# Altium PCB CanBUS_stepper_STM32.PcbDoc
Units mm, origin at the board's own origin, x right, y up, seen from the top; angles counter-clockwise.
Board outline 42.3 x 42.32 mm, 4 copper layers (Top Layer, Int1 (GND), Int2 (PWR), Bottom Layer), stack 1.334 mm thick; 83 components, 59 nets, 331 pads, 174 vias.
Unrouted connection lines stored in the file: 1.
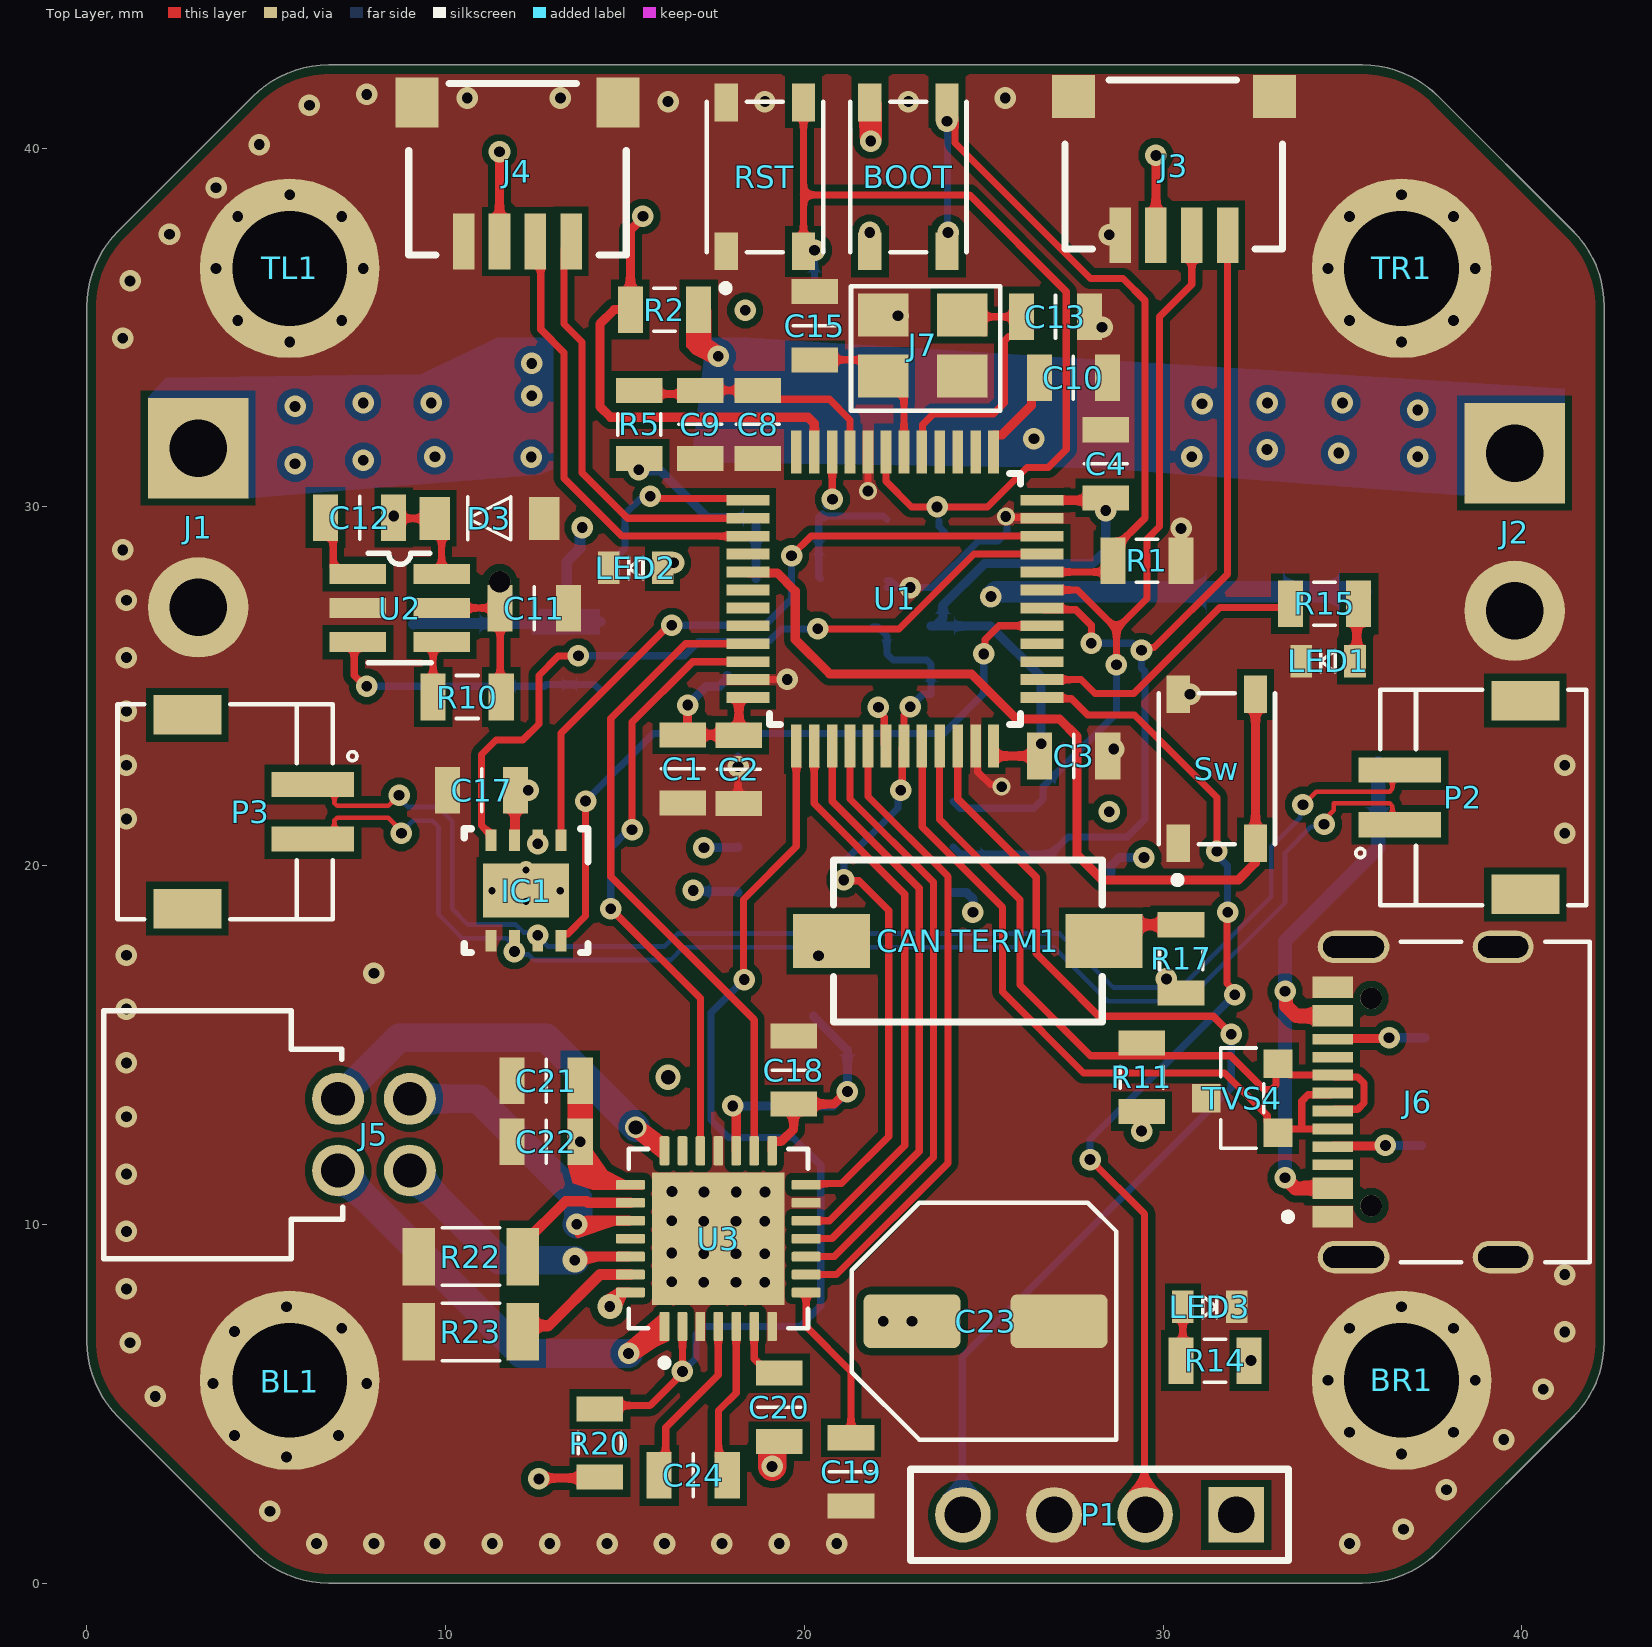
[diagram p0: Top Layer view]
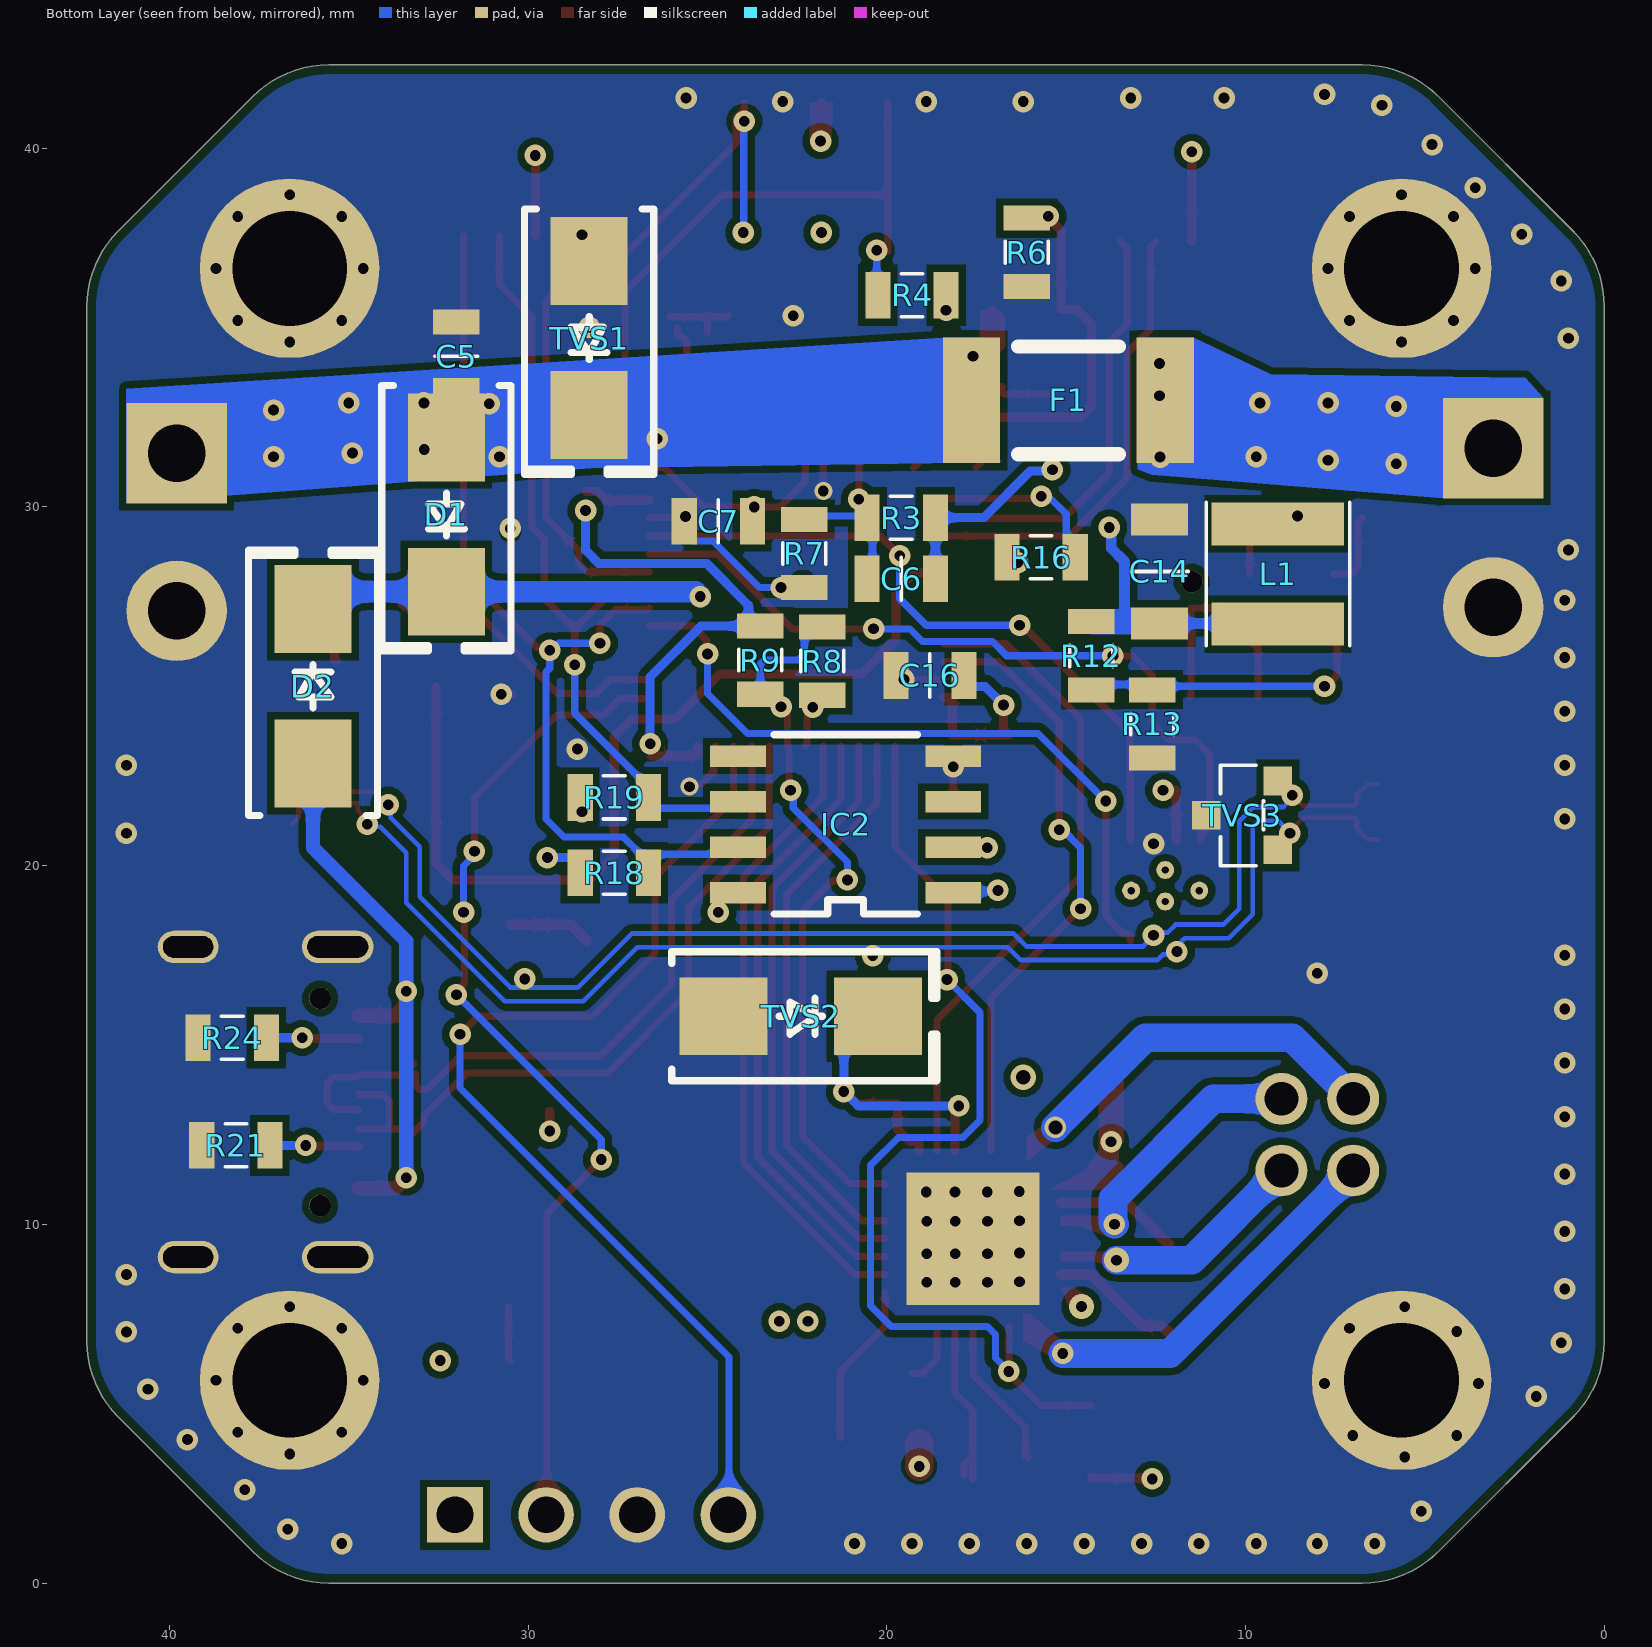
[diagram p1: Bottom Layer view, seen from below]
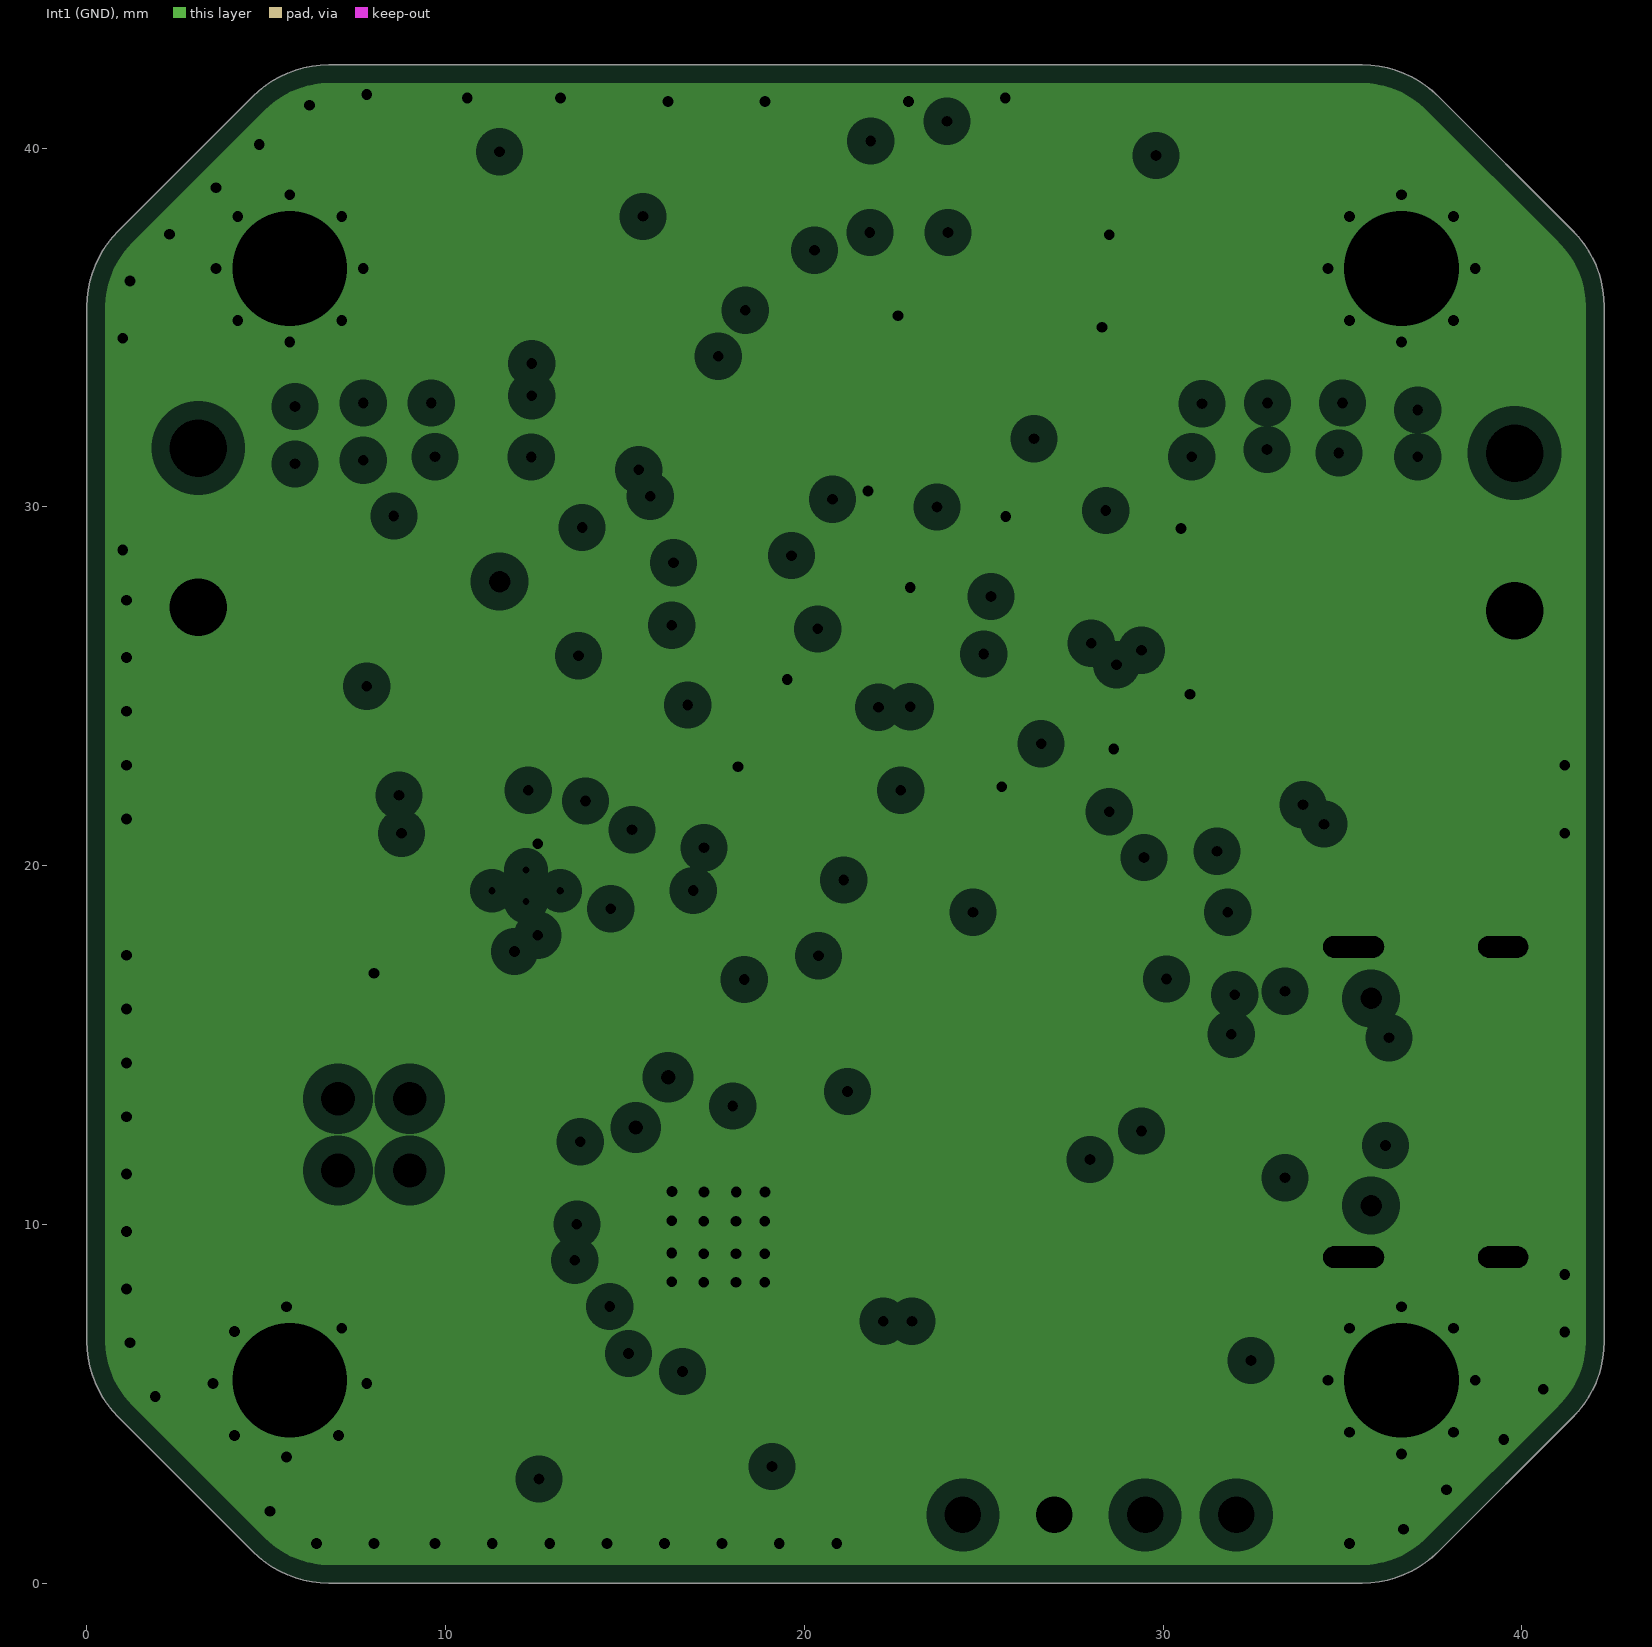
[diagram p2: Int1 (GND), clearances drawn from the general rule]
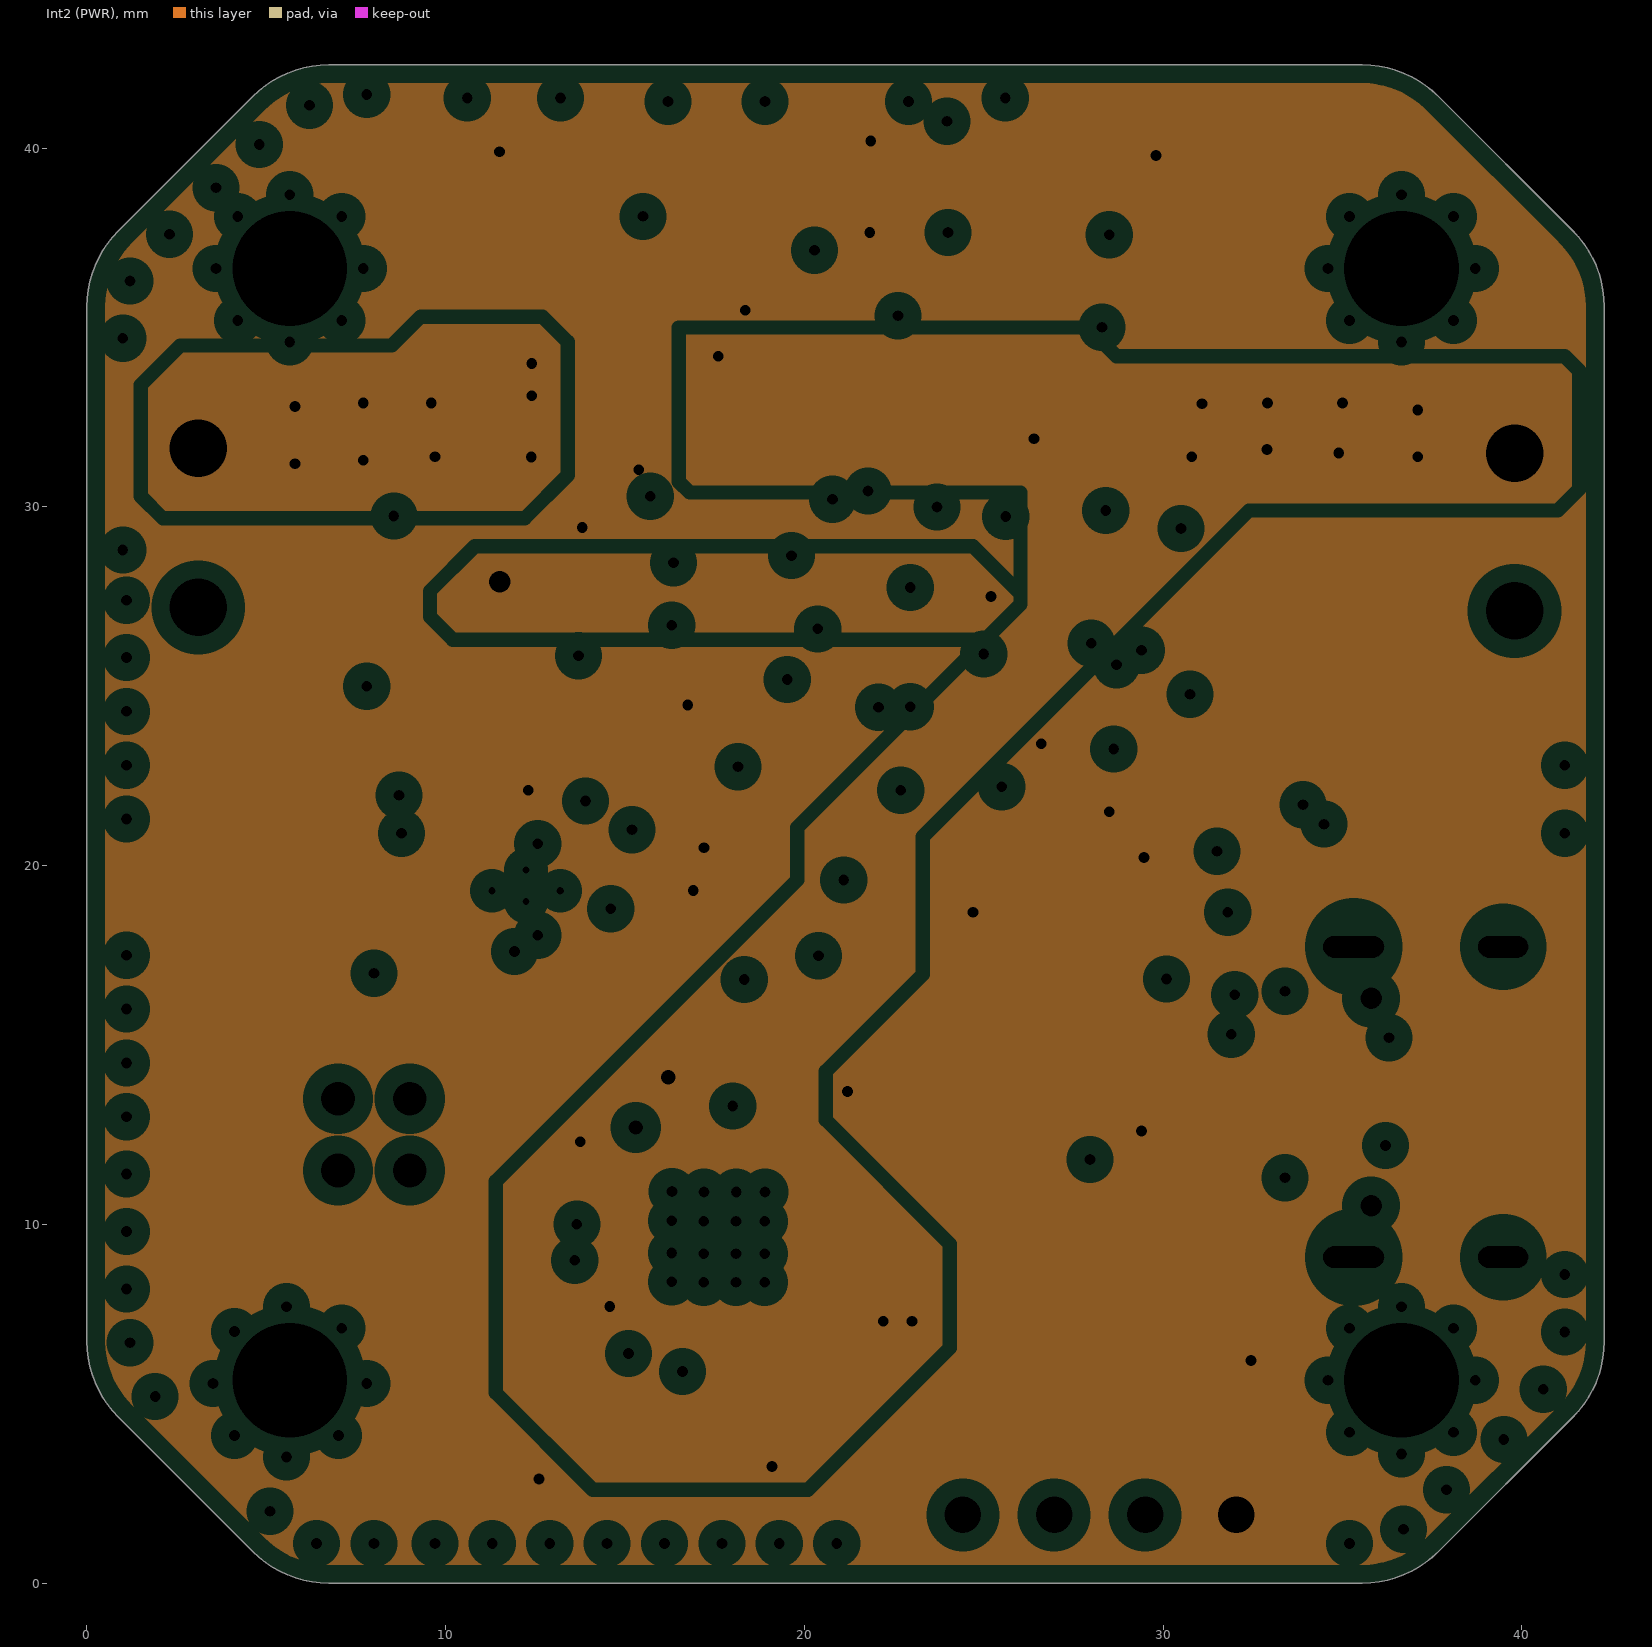
[diagram p3: Int2 (PWR), clearances drawn from the general rule]

## Layer stack, top to bottom
Top Solder: solder mask 0.0254, SM-001, Dk 4
Top Layer: signal copper 0.035
Dielectric 1: prepreg 0.1295, PP-017, Dk 4.3
Dielectric 2: prepreg 0.1295, PP-017, Dk 4.3
Int1 (GND): plane copper 0.0175, net GND
Dielectric 3: core 0.7112, Core-039, Dk 4.8
Int2 (PWR): plane copper 0.0175, net (Multiple Nets)
Dielectric 4: prepreg 0.1295, PP-017, Dk 4.3
Dielectric 5: prepreg 0.1295, PP-017, Dk 4.3
Bottom Layer: signal copper 0.035
Bottom Solder: solder mask 0.0254, SM-001, Dk 4

## Board outline
4.622,0.879 0.879,4.622 cw(c3,6.743) 0,6.743 0,35.577 cw(c3,35.577) 0.879,37.698 4.622,41.441 cw(c6.743,39.32) 6.743,42.32 35.557,42.32 cw(c35.557,39.32) 37.678,41.441 41.421,37.698 cw(c39.3,35.577) 42.3,35.577 42.3,6.743 cw(c39.3,6.743) 41.421,4.622 37.678,0.879 cw(c35.557,3) 35.557,0 6.743,0 cw(c6.743,3)

## Design rules (kind name [scope] priority, off if disabled: settings)
BoardOutlineClearance [All] p1: gap=0.254 ignorepadtopadclearanceinfootprint=FALSE except(0: Arc-SplitContinuation Track-SplitContinuation SMDPad-SplitContinuation THPad-SplitContinuation Via-SplitContinuation Fill-SplitContinuation Poly-SplitContinuation Region-SplitContinuation Text-SplitContinuation)
Clearance [All] p1: gap=0.195 ignorepadtopadclearanceinfootprint=FALSE
DiffPairsRouting [All] p1: maxlimit=1 minlimit=0.101 mostfreqgap=0.25 toplayer_minwidth=0.101 toplayer_maxwidth=0.381 toplayer_prefwidth=0.13 bottomlayer_minwidth=0.101 bottomlayer_maxwidth=0.381 bottomlayer_prefwidth=0.13 maxuncoupledlength=5
HoleSize [All] p1: absolutevalues=TRUE maxlimit=6 minlimit=0.2 maxpercent=80.000 minpercent=20.000
MinimumSolderMaskSliver [All] p1: minsoldermaskwidth=0.1
PlaneClearance [All] p1: clearance=0.508
PlaneConnect [All] p1: planeconnectstyle=Direct reliefexpansion=0.508 reliefentries=4 reliefconductorwidth=0.254 reliefairgap=0.254
PolygonConnect [All] p1: connectstyle=Direct reliefconductorwidth=0.254 reliefentries=4 polygonreliefangle="90 Angle" airgapwidth=0.254
RoutingCorners [All] p1: cornerstyle=45-Degree minsetback=2 maxsetback=2
RoutingVias [All] p1: holewidth=0.3 width=0.6 viastyle="Through Hole" minholewidth=0.2 minwidth=0.4 maxholewidth=6 maxwidth=6
SilkToSolderMaskClearance [IsPad] p1: minsilkscreentomaskgap=0.1 clearancetoexposedcopper=TRUE
SolderMaskExpansion [All] p1: expansion=0 istentingtop=FALSE
SupplyNets "Schematic Supply Nets_3" [InNet('3V3')] p1: voltage=0.000
SupplyNets "Schematic Supply Nets_2" [InNet('XT30_OUT')] p2: voltage=0.000
SupplyNets "Schematic Supply Nets_1" [InNet('5V')] p3: voltage=0.000
SupplyNets "Schematic Supply Nets" [InNet('GND')] p4: voltage=0.000
Width [All] p1: maxlimit=10 minlimit=0.127 preferedwidth=0.254 minimp=50.000000 maximp=50.000000 favimp=50.000000
23 further rules are at their usual default settings.

## Classes and differential pairs
differential pair USB_D: +USB_D_P -USB_D_N
differential pair CAN: +CAN_P -CAN_N

## Components (designator, comment, footprint, x,y, rotation, side; value= is the part's Value field where it differs from the comment)
BL1 "Mounting Hole" "Mounting Hole - Hole-3.2mm, Pad-5mm"#1 5.56,5.56 r0 top
BOOT "Tactile, SPST" SW_PTS810_SJM_250_SMTR_LFS 22.9,39.2 r270 top
BR1 "Mounting Hole" "Mounting Hole - Hole-3.2mm, Pad-5mm"#2 36.65,5.65 r0 top
C1 "Capacitor_Ceramic" Capacitor_Ceramic_M2012_I0805 16.604,22.696 r270 top value=4.7UFf
C2 "Capacitor_Ceramic" Capacitor_Ceramic_M2012_I0805 18.175,22.685 r90 top
C3 "Capacitor_Ceramic" Capacitor_Ceramic_M2012_I0805 27.506,23.056 r180 top
C4 "Capacitor_Ceramic" Capacitor_Ceramic_M2012_I0805 28.4,31.2 r270 top value=100nf
C5 "Capacitor_Ceramic" Capacitor_Ceramic_M2012_I0805 32.002,34.2 r90 bottom value=100nf
C6 "Capacitor_Ceramic" Capacitor_Ceramic_M2012_I0805 19.6,28 r0 bottom value=100nf
C7 "Capacitor_Ceramic" Capacitor_Ceramic_M2012_I0805 24.7,29.6 r180 bottom value=100nf
C8 "Capacitor_Ceramic" Capacitor_Ceramic_M2012_I0805 18.7,32.3 r270 top value=100nf
C9 "Capacitor_Ceramic" Capacitor_Ceramic_M2012_I0805 17.1,32.3 r270 top value=100nf
C10 "Capacitor_Ceramic" Capacitor_Ceramic_M2012_I0805 27.5,33.6 r0 top value=4.7uf
C11 "Capacitor_Ceramic" Capacitor_Ceramic_M2012_I0805 12.469,27.179 r0 top value=4.7uf
C12 "Capacitor_Ceramic" Capacitor_Ceramic_M2012_I0805 7.6,29.7 r0 top value=100nf
C13 "Capacitor_Ceramic" Capacitor_Ceramic_M2012_I0805 27,35.3 r0 top value=22pf
C14 "Capacitor_Ceramic" Capacitor_Ceramic_M3216_I1206 12.4,28.2 r90 bottom value=10uf
C15 "Capacitor_Ceramic" Capacitor_Ceramic_M2012_I0805 20.292,35.051 r90 top value=22pf
C16 "Capacitor_Ceramic" Capacitor_Ceramic_M2012_I0805 18.8,25.3 r0 bottom value=100nf
C17 "Capacitor_Ceramic" Capacitor_Ceramic_M2012_I0805 11,22.1 r180 top value=100nf
C18 "Capacitor_Ceramic" Capacitor_Ceramic_M2012_I0805 19.7,14.3 r270 top value=100nf
C19 "Capacitor_Ceramic" Capacitor_Ceramic_M2012_I0805 21.3,3.1 r90 top value=4.7uf
C20 "Capacitor_Ceramic" Capacitor_Ceramic_M2012_I0805 19.3,4.9 r90 top value=100nf
C21 "Capacitor_Ceramic" Capacitor_Ceramic_M2012_I0805 12.8,14 r180 top value=100nf
C22 "Capacitor_Ceramic" Capacitor_Ceramic_M2012_I0805 12.8,12.3 r180 top value=100nf
C23 "MAL214699103E3" CAPACİTOR_6.3_5.4 25,7.3 r0 top value=100uf
C24 "Capacitor_Ceramic" Capacitor_Ceramic_M2012_I0805 16.9,3 r180 top value=22nf
"CAN TERM1" "Slide, SPST" "Slide, SPST - C&K, SDA01HxS" 24.557,17.9 r270 top
D1 "Diode_Tvs" "DO214AA SMB" 32.281,29.785 r270 bottom
D2 "Diode_Tvs" "DO214AA SMB" 36,25 r90 bottom
D3 "Diode_Zener" Diode_SOD-123F 11.219,29.679 r180 top
F1 "Resistor" Resistor_Smd_M6332_I2512 14.94,32.973 r0 bottom value=12A
IC1 "TCAN3414DRBR" TCAN3414DRBR 12.241,19.302 r270 top
IC2 "MT6701" "SOIC-8, NB" 21.15,21.15 r0 bottom
J1 "2pin_header" 2pin_header#1 3.1,29.1 r270 top
J2 "2pin_header" 2pin_header#2 39.9,28.6 r270 top
J3 "SM04B-SRSS-TB" SM04B-SRSS-TB#1 30.3,39.6 r0 top
J4 "SM04B-SRSS-TB" SM04B-SRSS-TB#2 12,39.432 r0 top
J5 "878330420" 0878330420 9,11.5 r270 top
J6 "TYPE-C-31-M-12" HRO_TYPE-C-31-M-12 39.48,13.41 r90 top
J7 "SMD3225" SMD3225 23.3,34.5 r180 top
L1 "Inductor" "Taiyo Yuden - Power Inductor, 4040TK" 9.1,28.129 r270 bottom value=22uh
LED1 "Diode_Led" Diode_Smd_M1608_I0603_Blue 34.6,25.7 r180 top
LED2 "Diode_Led" Diode_Smd_M1608_I0603_Red 15.3,28.3 r180 top
LED3 "Diode_Led" Diode_Smd_M1608_I0603_Green 31.3,7.7 r0 top
P1 "TSW-104-08-G-S" SMTC-TSW-104-08-X-S 32.04,1.9 r180 top
P2 "S2B-ZR-SM4A-TF" JST_S2B-ZR-SM4A-TF 36.6,21.9 r270 top
P3 "S2B-ZR-SM4A-TF" JST_S2B-ZR-SM4A-TF 6.3,21.5 r90 top
R1 "Resistor" Resistor_Smd_M2012_I0805 29.55,28.5 r180 top value=10k
R2 "Resistor" Resistor_Smd_M2012_I0805 16.1,35.5 r0 top value=47k
R3 "Resistor" Resistor_Smd_M2012_I0805 19.6,29.7 r0 bottom value=10K
R4 "Resistor" Resistor_Smd_M2012_I0805 19.3,35.9 r0 bottom value=10k
R5 "Resistor" Resistor_Smd_M2012_I0805 15.4,32.3 r90 top value=ferrit
R6 "Resistor" Resistor_Smd_M2012_I0805 16.1,37.1 r90 bottom value=4.7k
R7 "Resistor" Resistor_Smd_M2012_I0805 22.3,28.7 r270 bottom value="10K NTC"
R8 "Resistor" Resistor_Smd_M2012_I0805 21.8,25.7 r270 bottom value=1k
R9 "Resistor" Resistor_Smd_M2012_I0805 23.528,25.728 r90 bottom value=4.7k
R10 "Resistor" Resistor_Smd_M2012_I0805 10.6,24.7 r0 top value=100k
R11 "Resistor" Resistor_Smd_M2012_I0805 29.4,14.1 r90 top value=1.5k
R12 "Resistor" Resistor_Smd_M2012_I0805 14.3,25.85 r90 bottom value=33k
R13 "Resistor" Resistor_Smd_M2012_I0805 12.6,23.95 r90 bottom value=10k
R14 "Resistor" Resistor_Smd_M2012_I0805 31.45,6.2 r0 top value=1k
R15 "Resistor" Resistor_Smd_M2012_I0805 34.5,27.3 r180 top value=1k
R16 "Resistor" Resistor_Smd_M2012_I0805 15.7,28.6 r180 bottom value=1k
R17 "Resistor" Resistor_Smd_M2012_I0805 30.5,17.4 r270 top value=120
R18 "Resistor" Resistor_Smd_M2012_I0805 27.6,19.8 r180 bottom value=4.7k
R19 "Resistor" Resistor_Smd_M2012_I0805 27.6,21.9 r180 bottom value=4.7k
R20 "Resistor" Resistor_Smd_M2012_I0805 14.3,3.9 r270 top value=10k
R21 "Resistor" Resistor_Smd_M2012_I0805 38.15,12.2 r180 bottom value=5.1K
R22 "Resistor" Resistor_Smd_M3216_I1206 10.7,9.1 r0 top value=100m
R23 "Resistor" Resistor_Smd_M3216_I1206 10.7,7 r0 top
R24 "Resistor" Resistor_Smd_M2012_I0805 38.25,15.2 r180 bottom value=5.1K
RST "Tactile, SPST" SW_PTS810_SJM_250_SMTR_LFS 18.9,39.2 r90 top
Sw "Tactile, SPST" SW_PTS810_SJM_250_SMTR_LFS 31.5,22.7 r90 top
TL1 "Mounting Hole" "Mounting Hole - Hole-3.2mm, Pad-5mm"#2 5.65,36.65 r0 top
TR1 "Mounting Hole" "Mounting Hole - Hole-3.2mm, Pad-5mm"#2 36.65,36.65 r0 top
TVS1 "Diode_Tvs" "DO214AA SMB" 28.3,34.708 r270 bottom
TVS2 "Diode_Tvs" "DO214AA SMB" 22.4,15.8 r180 bottom
TVS3 "Diode_Tvs_2P_Bidirectional" Diode_SOT-23-3_2P_Bidirectional_Type_1 10.1,21.4 r270 bottom
TVS4 "Diode_Tvs_2P_Bidirectional" Diode_SOT-23-3_2P_Bidirectional_Type_1 32.202,13.515 r270 top
U1 "STM32F303CCT6" "QFP-48, 7mm x 7mm, 0.5mm" 22.525,27.435 r270 top
U2 "LMR16006XDDCR" DDC0006A 8.719,27.179 r0 top
U3 "TMC2209-LA" QFN50P500X500X90-29N 17.6,9.6 r90 top

## Footprints (in the part's own frame and the unit in brackets; to place one, negate y for a bottom-side part, rotate by r counter-clockwise, add the part's x,y. Pads: shape width x height; smd on the part's side, far side on the other; paste and mask are expansions set on the pad)
2pin_header#1 [mm]
  rect 2.8x2.8 hole 1.6: 1(-2.54,0)
  round 2.8 hole 1.6: 2(1.9,0)
2pin_header#2 [mm]
  rect 2.8x2.8 hole 1.6: 1(-2.9,-0.1)
  round 2.8 hole 1.6: 2(1.5,-0.1)
0878330420 [mil]
  round 57 hole 37 paste-99999 mask+0: 1(0,0) 2(0,-78.74) 3(-78.74,0) 4(-78.74,-78.74)
  silkscreen extent -175,-336 97,-74, body extent -171,-331 91,10, height 242
Capacitor_Ceramic_M2012_I0805 [mm] "Capacitor_Ceramic_M2012_I0805"
  rect 0.7x1.3 smd mask+0.05: 1(-0.95,0) 2(0.95,0)
  silkscreen extent 0,-0.6 0,0.6, body extent -1.09,-0.64 1.09,0.64, height 1.26
Capacitor_Ceramic_M3216_I1206 [mm] "Capacitor_Ceramic_M3216_I1206"
  rect 0.9x1.6 smd mask+0.05: 1(-1.45,0) 2(1.45,0)
  silkscreen extent 0,-0.8 0,0.8, body extent -1.75,-0.81 1.75,0.81, height 1.61
CAPACİTOR_6.3_5.4 [mm]
  rrect25% 2.7x1.5 smd: 1(-2,0) 2(2.1,0)
  silkscreen extent -3.68,-3.3 3.7,3.3, body extent -3.5,-3.3 3.5,3.3, height 8.05
DDC0006A [mil]
  rect 62x22 smd paste-4 mask+2: 1(-46,37.4) 2(-46,0) 3(-46,-37.4) 4(46,-37.4) 5(46,0) 6(46,37.4)
  silkscreen extent -34,-60 34,60, body extent -56,-57 56,57, height 37
Diode_Smd_M1608_I0603_Blue [mm] "Diode_Smd_M1608_I0603_Blue"
  rect 0.6x0.9 smd mask+0.05: A(-0.75,0) C(0.75,0)
  silkscreen extent -0.2,-0.3 0.2,0.3, body extent -0.8,-0.4 0.8,0.4, height 0.7
Diode_Smd_M1608_I0603_Green [mm] "Diode_Smd_M1608_I0603_Green"
  rect 0.6x0.9 smd mask+0.05: A(-0.75,0) C(0.75,0)
  silkscreen extent -0.2,-0.3 0.2,0.3, body extent -0.8,-0.4 0.8,0.4, height 0.7
Diode_Smd_M1608_I0603_Red [mm] "Diode_Smd_M1608_I0603_Red"
  rect 0.6x0.9 smd mask+0.05: A(-0.75,0) C(0.75,0)
  silkscreen extent -0.2,-0.3 0.2,0.3, body extent -0.8,-0.4 0.8,0.4, height 0.7
Diode_SOD-123F [mm] "Diode_SOD-123F"
  rect 0.85x1.2 smd mask+0.05: A(-1.525,0) C(1.525,0)
  silkscreen extent -0.6,-0.6 0.6,0.6, body extent -1.85,-0.85 1.9,0.85, height 1.2
Diode_SOT-23-3_2P_Bidirectional_Type_1 [mm] "Diode_SOT-23-3_2P_Bidirectional_Type_1"
  rect 0.8x0.8 smd mask+0.05: Common(0,-1) D1(-0.96,1) D2(0.96,1)
  silkscreen extent -1.4,-0.6 1.4,0.6, body extent -1.46,-1.23 1.46,1.25, height 1.03
"DO214AA SMB" [mm] "Molded Diode, 2-Leads, Body 4.31x3.62mm, IPC Medium Density"
  rect 2.45x2.15 smd: A(-2.15,0) C(2.15,0)
  silkscreen extent -3.6,-1.8 3.8,1.8, body extent -2.6,-1.8 2.6,1.8, height 2.4
HRO_TYPE-C-31-M-12 [mm]
  rect 0.6x1.14 smd mask+0.05: A1_B12(-3.2,4.75) A4_B9(-2.4,4.75) B1_A12(3.2,4.75) B4_A9(2.4,4.75)
  rect 0.3x1.14 smd mask+0.05: A5(-1.25,4.75) A6(-0.25,4.75) A7(0.25,4.75) A8(1.25,4.75) B5(1.75,4.75) B6(0.75,4.75) B7(-0.75,4.75) B8(-1.75,4.75)
  oval 0.9x2 hole 0.6 slot 1.7 at 90 deg: S1(-4.325,4.17) S2(4.325,4.17)
  oval 0.9x1.7 hole 0.6 slot 1.4 at 90 deg: S3(-4.325,0) S4(4.325,0)
  round 0.6 hole 0.6 unplated: ""(-2.89,3.68) ""(2.89,3.68)
  silkscreen extent -4.47,-2.42 4.47,6.1, body extent -4.47,-2.6 4.47,5.31, height 3.31
JST_S2B-ZR-SM4A-TF [mm]
  rect 0.7x2.3 smd: 1(0.762,0) 2(-0.762,0)
  rect 1.1x1.9 smd: 3(-2.7,3.5) 4(2.7,3.5)
  silkscreen extent -3,-1.23 3,5.2, body extent -3.01,-0.84 2.99,5.66, height 3.7
"Mounting Hole - Hole-3.2mm, Pad-5mm"#1 [mm] "Mounting Hole - Hole-3.2mm, Pad-5mm"
  round 0.6 hole 0.3 mask+0.05: Hole(-2.05,0) Hole(-1.45,-1.45) Hole(-1.45,1.45) Hole(0,-2.05) Hole(0,2.14) Hole(1.45,-1.45) Hole(1.54,1.54) Hole(2.24,0)
  round 5 hole 3.2 mask+0.05: Hole(0.09,0.09)
"Mounting Hole - Hole-3.2mm, Pad-5mm"#2 [mm] "Mounting Hole - Hole-3.2mm, Pad-5mm"
  round 0.6 hole 0.3 mask+0.05: Hole(-2.05,0) Hole(-1.45,-1.45) Hole(-1.45,1.45) Hole(0,-2.05) Hole(0,2.05) Hole(1.45,-1.45) Hole(1.45,1.45) Hole(2.05,0)
  round 5 hole 3.2 mask+0.05: Hole(0,0)
QFN50P500X500X90-29N [mm]
  rrect25% 0.81x0.27 smd: 1(-2.45,1.5) 2(-2.45,1) 3(-2.45,0.5) 4(-2.45,0) 5(-2.45,-0.5) 6(-2.45,-1) 7(-2.45,-1.5) 15(2.45,-1.5) 16(2.45,-1) 17(2.45,-0.5) 18(2.45,0) 19(2.45,0.5) 20(2.45,1) 21(2.45,1.5)
  rrect25% 0.27x0.81 smd: 8(-1.5,-2.45) 9(-1,-2.45) 10(-0.5,-2.45) 11(0,-2.45) 12(0.5,-2.45) 13(1,-2.45) 14(1.5,-2.45) 22(1.5,2.45) 23(1,2.45) 24(0.5,2.45) 25(0,2.45) 26(-0.5,2.45) 27(-1,2.45) 28(-1.5,2.45)
  rect 3.7x3.7 smd paste-0.68: 29(0,0)
  silkscreen extent -3.56,-2.5 2.5,2.5, body extent -2.5,-2.5 2.5,2.5, height 0.9
"QFP-48, 7mm x 7mm, 0.5mm" [mm] "QFP-48, 7mm x 7mm, 0.5mm"
  rect 1.2x0.3 smd mask+0.05: 1(-4.1,2.75) 2(-4.1,2.25) 3(-4.1,1.75) 4(-4.1,1.25) 5(-4.1,0.75) 6(-4.1,0.25) 7(-4.1,-0.25) 8(-4.1,-0.75) 9(-4.1,-1.25) 10(-4.1,-1.75) 11(-4.1,-2.25) 12(-4.1,-2.75) 25(4.1,-2.75) 26(4.1,-2.25) 27(4.1,-1.75) 28(4.1,-1.25) 29(4.1,-0.75) 30(4.1,-0.25) 31(4.1,0.25) 32(4.1,0.75) 33(4.1,1.25) 34(4.1,1.75) 35(4.1,2.25) 36(4.1,2.75)
  rect 0.3x1.2 smd mask+0.05: 13(-2.75,-4.1) 14(-2.25,-4.1) 15(-1.75,-4.1) 16(-1.25,-4.1) 17(-0.75,-4.1) 18(-0.25,-4.1) 19(0.25,-4.1) 20(0.75,-4.1) 21(1.25,-4.1) 22(1.75,-4.1) 23(2.25,-4.1) 24(2.75,-4.1) 37(2.75,4.1) 38(2.25,4.1) 39(1.75,4.1) 40(1.25,4.1) 41(0.75,4.1) 42(0.25,4.1) 43(-0.25,4.1) 44(-0.75,4.1) 45(-1.25,4.1) 46(-1.75,4.1) 47(-2.25,4.1) 48(-2.75,4.1)
  silkscreen extent -3.5,-3.5 3.5,3.5, body extent -4.5,-4.5 4.5,4.5, height 1.52
Resistor_Smd_M2012_I0805 [mm] "Resistor_Smd_M2012_I0805"
  rect 0.7x1.3 smd mask+0.05: 1(-0.95,0) 2(0.95,0)
  silkscreen extent -0.3,-0.6 0.3,0.6, body extent -1,-0.61 1,0.61, height 0.6
Resistor_Smd_M3216_I1206 [mm] "Resistor_Smd_M3216_I1206"
  rect 0.9x1.6 smd mask+0.05: 1(-1.45,0) 2(1.45,0)
  silkscreen extent -0.8,-0.8 0.8,0.8, body extent -1.6,-0.81 1.6,0.81, height 0.65
Resistor_Smd_M6332_I2512 [mm] "Resistor_Smd_M6332_I2512"
  rect 1.6x3.5 smd mask+0.05: 1(-2.7,0) 2(2.7,0)
  silkscreen extent -1.4,-1.5 1.4,1.5, body extent -3.15,-1.61 3.15,1.61, height 0.7
"Slide, SPST - C&K, SDA01HxS" [mm] "Slide, SPST - C&K, SDA01HxS"
  rect 1.5x2.15 smd mask+0.05: A(0,3.8) B(0,-3.8)
  silkscreen extent -2.26,-3.74 2.26,3.74, body extent -1.74,-4.9 1.74,4.9, height 4.36
SM04B-SRSS-TB#1 [mm] "1.0mm pitch/Disconnectable Crimp style connector"
  rect 0.6x1.55 smd: 1(-1.5,-2.032) 2(-0.5,-2.032) 3(0.5,-2.032) 4(1.5,-2.032)
  rect 1.2x1.2 smd: SHIELD(-2.8,1.843) SHIELD(2.8,1.843)
  silkscreen extent -3.03,-2.41 3.03,2.3, body extent -3,-2.38 3,2.57, height 2.95
SM04B-SRSS-TB#2 [mm] "1.0mm pitch/Disconnectable Crimp style connector"
  rect 0.6x1.55 smd: 1(-1.5,-2.032) 2(-0.5,-2.032) 3(0.5,-2.032) 4(1.5,-2.032)
  rect 1.2x1.4 smd: SHIELD(-2.8,1.843) SHIELD(2.8,1.843)
  silkscreen extent -3.03,-2.41 3.03,2.37, body extent -3,-2.38 3,2.57, height 2.95
SMD3225 [mm]
  rect 1.4x1.2 smd: 1(-1.1,-0.85) 2(1.1,-0.85) 3(1.1,0.85) 4(-1.1,0.85)
  silkscreen extent -2.16,-1.65 2,1.82
SMTC-TSW-104-08-X-S [mm] ".025 SQ Post Terminal Strip Assembly, 1x4 Pins, Vertical, 2.54mm Pitch, Male"
  rect 1.55x1.55 hole 1.02: 1(0,0)
  round 1.55 hole 1.02: 2(2.54,0) 3(5.08,0) 4(7.62,0)
  silkscreen extent -1.46,-1.27 9.08,1.27, body extent -1.27,-1.27 8.89,1.27, height 8.38
"SOIC-8, NB" [mm] "SOIC-8, NB"
  rect 1.55x0.6 smd mask+0.05: 1(-3,1.905) 2(-3,0.635) 3(-3,-0.635) 4(-3,-1.905) 5(3,-1.905) 6(3,-0.635) 7(3,0.635) 8(3,1.905)
  silkscreen extent -2,-2.5 2,2.5, body extent -3.1,-2.5 3.1,2.5, height 1.75
SW_PTS810_SJM_250_SMTR_LFS [mm]
  rect 1.05x0.65 smd: A(-2.075,-1.075) A(2.075,-1.075) B(-2.075,1.075) B(2.075,1.075)
  silkscreen extent -2.1,-1.62 2.1,1.62, body extent -2.3,-1.6 2.3,1.6, height 2.7
"Taiyo Yuden - Power Inductor, 4040TK" [mm] "Taiyo Yuden - Power Inductor, 4040TK"
  rect 1.2x3.7 smd mask+0.05: 1(-1.4,0) 2(1.4,0)
  silkscreen extent -2,-2 2,2, body extent -2,-2 2,2, height 1.2
TCAN3414DRBR [mm]
  rect 0.6x0.3 smd paste+0 mask+0.051: 1(-1.4,0.975) 2(-1.4,0.325) 3(-1.4,-0.325) 4(-1.4,-0.975) 5(1.4,-0.975) 6(1.4,-0.325) 7(1.4,0.325) 8(1.4,0.975)
  rect 1.5x2.4 smd paste-1.187 mask+0.051: 9(0,0)
  round 0.5 hole 0.203 paste-2539.97 mask+0.051: V(-0.575,0) V(0,0.95) V(0,-0.95) V(0.302,0)
  silkscreen extent -1.73,-1.73 1.73,1.73, body extent -1.5,-1.51 1.5,1.49, height 0.77

## Part data
BL1 BR1 TL1 TR1: "Mechanical, Mounting Hole", Component Category=Mechanical, Component Type="Mounting Hole"
BOOT "CAN TERM1" RST Sw: "*", Operating Temperature, Max=+*℃, Operating Temperature, Min=-*℃, Component Category=Switch, ComponentLink1Description=Datasheet, ComponentLink2Description="Supplier Link"
  BOOT RST Sw: Component Type=Tactile
  "CAN TERM1": Component Type=Slide
C1 C4 C7 C8 C9 C10 C13 C15 R1 R4 R5 R8 R9 R11: Operating Temperature, Max=*℃, Package=0805, ComponentLink1Description=Datasheet, ComponentLink2Description="Supplier Link", Operating Temperature, Min=*℃
  C1 C4 C7 C8 C9 C10 C13 C15: Component Category=Capacitor, Component Type=Ceramic
  R1 R4 R5 R8 R9 R11: Component Category=Resistor, Component Type="Fixed Value"
C2 C3 D1 D2 D3 LED1 LED2 LED3 TVS4: Operating Temperature, Max=*℃, ComponentLink1Description=Datasheet, ComponentLink2Description="Supplier Link", Operating Temperature, Min=*℃
  C2 C3: Component Category=Capacitor, Component Type=Ceramic
  D1 D2: Component Category=Diode, Component Type=Zener, ComponentLink2URL=https://www.e-komponent.com/diode-30-v
  D3: Component Category=Diode, Component Type=Zener
  LED1 LED2 LED3: Component Category=Diode, Component Type=Led
  TVS4: Component Category=Diode, Component Type=TVS
C5 C12 C14 C16 C17 C18 C19 C20 C21 C22 C24: Operating Temperature, Max=*℃, Package=0.805, Voltage=35V, Component Category=Capacitor, Component Type=Ceramic, ComponentLink1Description=Datasheet, ComponentLink2Description="Supplier Link", Operating Temperature, Min=*℃
C6: Operating Temperature, Max=*℃, Package=0.805, Voltage=31V, Component Category=Capacitor, Component Type=Ceramic, ComponentLink1Description=Datasheet, ComponentLink2Description="Supplier Link", Operating Temperature, Min=*℃
C11: Operating Temperature, Max=*℃, Package=0.805, Voltage=50V, Component Category=Capacitor, Component Type=Ceramic, ComponentLink1Description=Datasheet, ComponentLink2Description="Supplier Link", Operating Temperature, Min=*℃
C23: "100 ÂµF 50 V Aluminum Electrolytic Capacitors Radial, Can - SMD - 1500 Hrs @ 125Â°C", Package="Radial Vishay BC", Availability="In Stock", Check_prices=https://www.snapeda.com/parts/MAL214699103E3/Vishay+BC+Components/view-part/?ref=eda, MF="Vishay BC", MP=MAL214699103E3, Price=None, Purchase-URL=https://pricing.snapeda.com/search?q=MAL214699103E3&ref=eda, SnapEDA_Link=https://www.snapeda.com/parts/MAL214699103E3/Vishay+BC+Components/view-part/?ref=snap
F1: Operating Temperature, Max=*℃, Package=6125, Component Category=fuse, Component Type="Fixed Value", ComponentLink1Description=Datasheet, ComponentLink2Description="Supplier Link", ComponentLink2URL=https://www.e-komponent.com/12-a-125-v-ac-125-v-dc-fuse-board-mount, Operating Temperature, Min=*℃, Supplier Link=https://www.e-komponent.com/12-a-125-v-ac-125-v-dc-fuse-board-mount
IC2: "Hall Effect Sensor Angle External Magnet, Not Included Gull Wing", Package="SOIC-8 ams", Check_prices=https://www.snapeda.com/parts/AS5600-ASOT/ams/view-part/?ref=eda, MF=ams, MP=AS5600-ASOT, SnapEDA_Link=https://www.snapeda.com/parts/AS5600-ASOT/ams/view-part/?ref=snap
J3 J4: "Connector Header Surface Mount 4 position 0.079 (2.00mm)", Package="NON STANDARD-4 JST", Check_prices=https://www.snapeda.com/parts/B4B-PH-SM4-TB%20(LF)(SN)/JST+Sales+America+Inc./view-part/?ref=eda, MF="JST Sales", MP="B4B-PH-SM4-TB (LF)(SN)", SnapEDA_Link=https://www.snapeda.com/parts/B4B-PH-SM4-TB%20(LF)(SN)/JST+Sales+America+Inc./view-part/?ref=snap
J5: "2.00mm Pitch, Milli-Grid PCB Header, Dual Row, Right-Angle, Through Hole, 4 Circuits, 0.38Âµm Gold (Au) Plating, without PCB Locator, without  Locking Window, without Center Polarization Slot, Tube", Manufacturer_Name="Molex Connector Corporation", Copyright="Copyright (C) 2026 Ultra Librarian. All rights reserved.", Manufacturer_Part_Number=878330420, RefDes=RefDes, Type=Type
J6: "USB Connectors 24 Receptacle 1 8.94*7.3mm RoHS", Package=Package, Check_prices=https://www.snapeda.com/parts/TYPE-C-31-M-12/HRO+Electronics+Co.%252C+Ltd./view-part/?ref=eda, MF="HRO Electronics Co., Ltd.", MP=TYPE-C-31-M-12, SnapEDA_Link=https://www.snapeda.com/parts/TYPE-C-31-M-12/HRO+Electronics+Co.%252C+Ltd./view-part/?ref=snap
J7: Package=None, Check_prices=https://www.snapeda.com/parts/SMD3225/Byte+Brothers/view-part/?ref=eda, MF=Others, MP=SMD3225, SnapEDA_Link=https://www.snapeda.com/parts/SMD3225/Byte+Brothers/view-part/?ref=snap
L1: "Inductor, Power, ???uH, ???A, ?x?x?mm", Operating Temperature, Max=*℃, Package=4040tk, Component Category=Inductor, Component Type="Power Inductor", ComponentLink1Description=Datasheet, ComponentLink2Description="Supplier Link", Operating Temperature, Min=*℃
P1: library part CMP-1024-00357-1, "0.025\" SQ Post Header, Through-hole, Vertical, -55 to 125 degC, 2.54 mm Pitch, 4-Pin, Male, RoHS", Manufacturer=Samtec, Temperature Range="-55 to 125 degC", ComponentLink1Description="Manufacturer URL", ComponentLink1URL=http://www.samtec.com, ComponentLink2Description=Datasheet, ComponentLink2URL=http://www.samtec.com/documents/webfiles/pdf/TSW_TH.PDF, ComponentLink3Description="Package Specification", ComponentLink3URL=http://www.samtec.com/documents/webfiles/cpdf/TSW-XXX-XX-XXX-X-XX-XXX-MKT.pdf, DatasheetVersion=F-214, Mounting Technology=Through-hole, Orientation=Vertical, PackageDescription=".025[0.64] SQ. Post Terminal Strip Assembly", PackageReference=TSW-104-08-X-S, PackageVersion="DM, 8/1988", PartNumber=TSW-104-08-G-S, Pitch="2.54 mm", RoHS=True
P2 P3: "Connector Header Surface Mount, Right Angle 2 position 0.059 (1.50mm)", Package=None, Check_prices=https://www.snapeda.com/parts/S2B-ZR-SM4A-TF/JST/view-part/?ref=eda, MF="JST Sales", MP=S2B-ZR-SM4A-TF, SnapEDA_Link=https://www.snapeda.com/parts/S2B-ZR-SM4A-TF/JST/view-part/?ref=snap
R2 R3 R6 R7 R10 R12 R13 R14 R15 R16 R17 R18 R19 R20 R21 R22 R23 R24: Operating Temperature, Max=*℃, Package=0.805, Component Category=Resistor, Component Type="Fixed Value", ComponentLink1Description=Datasheet, ComponentLink2Description="Supplier Link", Operating Temperature, Min=*℃
TVS1: Operating Temperature, Max=*℃, Voltage, Break Down=31.1V, Voltage, Stand Off=28V, Component Category=Diode, Component Type=Zener, ComponentLink1Description=Datasheet, ComponentLink2Description="Supplier Link", ComponentLink2URL=https://www.ozdisan.com/p/tvs-diyotlar-386/hottech-smbj28a-ht-503588, Operating Temperature, Min=*℃
TVS2: Operating Temperature, Max=*℃, Voltage, Stand Off=6V, Component Category=Diode, Component Type=Zener, ComponentLink1Description=Datasheet, ComponentLink2Description="Supplier Link", Operating Temperature, Min=*℃
TVS3: Operating Temperature, Max=*℃, Package=SOT23, Voltage, Break Down="26.2 V", Voltage, Stand Off="24 V", Component Category=Diode, Component Type=TVS, ComponentLink1Description=Datasheet, ComponentLink2Description="Supplier Link", Operating Temperature, Min=*℃
U1: "ARMÂ® CortexÂ®-M4 STM32F3 Microcontroller IC 32-Bit 72MHz 256KB (256K x 8) FLASH 48-LQFP (7x7)", Package="LQFP-48 STMicroelectronics", Availability="In Stock", Check_prices=https://www.snapeda.com/parts/STM32F303CCT6/STMicroelectronics/view-part/?ref=eda, MF=STMicroelectronics, MP=STM32F303CCT6, Price=None, Purchase-URL=https://pricing.snapeda.com/search/part/STM32F303CCT6/?ref=eda, SnapEDA_Link=https://www.snapeda.com/parts/STM32F303CCT6/STMicroelectronics/view-part/?ref=snap
U2: "SIMPLE SWITCHER&reg; 4V to 60V, 600mA Step-Down Regulator with Low Iq 6-SOT-23-THIN -40 to 125", Manufacturer="Texas Instruments", PartNumber=LMR16006XDDC, CompType=IC, Copyright="Copyright (C) 2026 Ultra Librarian. All rights reserved.", Manufacturer_Name="Texas Instruments", Manufacturer_Part_Number=LMR16006XDDCR, MountType=SMT, PackageReference=DDC0006A, RefDes=RefDes, RoHS=Y, Type=TYPE
U3: "Bipolar Motor Driver Power MOSFET Step/Direction, UART 28-QFN (5x5)", Package=None, Check_prices=https://www.snapeda.com/parts/TMC2209-LA/Maxim+Integrated/view-part/?ref=eda, MF="Maxim Integrated Products", MP=TMC2209-LA, SnapEDA_Link=https://www.snapeda.com/parts/TMC2209-LA/Maxim+Integrated/view-part/?ref=snap

## Free pads (board coordinates)
  rect 3.7x3.7 smd far side: 2(17.6,9.6)

## Via types
v1: diameter 0.6, hole 0.3, Top Layer to Bottom Layer, 166 vias
v2: diameter 0.5, hole 0.3, Top Layer to Bottom Layer, 3 vias
v3: diameter 0.7, hole 0.3, Top Layer to Bottom Layer, 2 vias
v4: diameter 0.6, hole 0.6, Top Layer to Bottom Layer, 1 vias
v5: diameter 0.6, hole 0.4, Top Layer to Bottom Layer, 1 vias
v6: diameter 0.7, hole 0.4, Top Layer to Bottom Layer, 1 vias

## Nets (pads, with @x,y where several pads share a name; then routed paths per layer and width w, separated by ;. In a path a pad name is that pad's centre, name@x,y a point inside that pad or via, vN(x,y) a via of type N, cw(c..) or ccw(c..) an arc to the next point about the centre after c; other vN are vias at no path point)
3V3: BOOT.A C1.1 C2.2 C3.2 C4.2 C6.1 C14.1 C16.1 C17.1 C18.2 IC1.3 IC2.1 IC2.2 IC2.8 J3.2 J4.2 L1.2 P1.1 R3.1 R4.1 R5.1 R9.2 R11.1 R12.2 R14.2 R18.1 R19.1 R20.2 TVS2.C U1.24 U1.36 U1.48 U3.15 U3.17 | length 58.5
  Top Layer w0.254: J4.2 v1(11.5,39.9) ; IC1.3 11.933,20.719 11.933,22.085 11.948,22.1 v1(12.3,22.1) ; v1(12.6,2.9) 12.625,2.925 14.275,2.925 R20.2 ; C1.1@16.6,23.65 16.608,23.643 18.167,23.643 C2.2 18.175,24.662 18.198,24.685 U1.24 ; C1.1 16.746,23.788 v1(16.746,24.477) ; v1(18,13.3) 18,13.206 18.1,13.106 U3.17 ; U3.15 19.1,12.287 19.135,12.322 19.372,12.322 19.7,12.65 C18.2 19.702,13.352 20.813,13.352 21.16,13.7 v1(21.2,13.7) ; U1.36 25.275,23.079 25.298,23.056 C3.2 ; U1.48 27.825,30.185 28.075,30.435 C4.2@28.375,30.435 ; v1(29.4,12.6) R11.1 ; J3.2 v1(29.8,39.8) ; R14.2 v1(32.45,6.2)
  Bottom Layer w0.254: v1(15.385,31.035) 15.42,31 16.001,31 17.301,29.7 R3.1 C6.1 ; v1(16.746,24.477) 17.268,24.998 17.627,24.998 17.85,25.222 C16.1 ; v1(16.903,19.309) 16.931,19.281 18.114,19.281 IC2.1 ; v1(17.2,20.5) 17.208,20.508 18.143,20.508 IC2.2 ; v1(18,13.3) 20.8,13.3 v1(21.2,13.7) 21.2,14.852 TVS2.C TVS2.C ; IC2.8 24.527,19.245 24.7,19.072 v1(24.7,18.7) ; v1(26.6,23.4) 26.6,25.26 25.182,26.678 R9.2 23.637,26.678 23.86,26.901 23.86,27.26 25.023,28.423 28.036,28.423 28.4,28.787 v1(28.4,29.9) ; R18.1 28.55,20 28.773,20.223 v1(29.465,20.223)
  Bottom Layer w0.3: L1.2 9.121,26.75 C14.1 12.45,26.8 13.375,26.8 ; v1(13.804,29.426) 13.746,29.368 13.746,28.846 13.375,28.475 13.375,26.8 ; R12.2 13.375,26.8
  other v1: 28.5,21.5 18.349,35.481 21.825,37.65 21.85,40.2
5V: C19.2 U3.8 | length 4.6
  Top Layer w0.2: U3.8 20.05,7.15 21.3,5.9 C19.2
A1: J5.3 U3.24 | length 6.6
  Bottom Layer w0.8: J5.3 10.9,13.5 13.697,10.703 13.697,10.041 v1(13.657,10.001)
A2: J5.4 U3.21 | length 10
  Bottom Layer w0.8: J5.4 8.7,15.2 12.8,15.2 v5(15.3,12.7)
AUX1: J4.3 U1.15 | length 12.7
  Top Layer w0.2: J4.3 12.65,37.25 12.65,34.95 13.3,34.3 13.3,30.8 14.915,29.185 U1.15
AUX2: J4.4 U1.14 | length 11.9
  Top Layer w0.2: J4.4 13.3,37.2 13.3,36.608 13.3,35.1 13.8,34.6 13.8,30.951 15.066,29.685 U1.14
B1: J5.1 U3.26 | length 5.6
  Bottom Layer w0.8: J5.1 11.5,9 v3(13.6,9)
B2: J5.2 U3.1 | length 10.2
  Bottom Layer w0.8: J5.2 12.1,6.4 v1(15.1,6.4)
CAN_N: "CAN TERM1.B" IC1.6 P2.1 P3.2 TVS3.D2 | length 38.7
  Top Layer w0.127: P3.2 6.612,20.738 6.899,21.025 6.899,21.262 6.973,21.337 8.4,21.337 8.765,20.972 v1(8.765,20.902) ; v1(34.489,21.156) 34.489,21.282 34.755,21.548 34.755,21.736 36.32,21.736 36.394,21.662 36.394,21.344 P2.1
  Bottom Layer w0.13: v1(8.765,20.902) 8.765,20.934 9.085,21.254 9.629,21.254 9.8,21.083 9.8,18.643 10.465,17.977 11.699,17.977 11.775,17.901 11.775,17.87 11.838,17.807 11.838,17.68 11.997,17.52 12.313,17.52 12.466,17.367 16.267,17.367 16.626,17.726 20.392,17.726 26.955,17.726 28.461,16.22 30.649,16.22 33.4,18.971 33.4,20.363 34.121,21.084 34.418,21.084 v1(34.489,21.156)
  other v1: 20.392,17.489 11.916,17.602
CAN_P: IC1.7 P2.2 P3.1 R17.2 TVS3.D1 | length 38.5
  Top Layer w0.127: P3.1 6.612,22.262 6.899,21.975 6.899,21.738 6.973,21.663 8.4,21.663 8.697,21.96 v1(8.7,21.96) ; v1(33.9,21.697) 34.267,22.063 36.32,22.063 36.394,22.138 36.394,22.456 P2.2
  Bottom Layer w0.13: v1(8.7,21.96) 8.7,21.877 8.943,21.634 9.787,21.634 10.18,21.241 10.18,18.8 10.623,18.357 11.952,18.357 12.174,18.135 12.489,18.135 v1(12.567,18.057) 12.567,18.029 12.849,17.747 16.11,17.747 16.469,18.106 27.112,18.106 28.618,16.6 30.093,16.6 30.492,16.6 33.02,19.128 33.02,20.52 33.828,21.329 33.828,21.625 v1(33.9,21.697)
  other v1: 30.093,16.841
CAN_RX: IC1.4 U1.45 | length 21.2
  Top Layer w0.2: IC1.4 11.266,20.852 11,21.119 11,23.1 11.4,23.5 12.15,23.5 12.6,23.95 12.6,25.3 13.14,25.84 13.69,25.84 v1(13.7,25.85) ; v1(20.373,26.6) 22.641,26.6 24.726,28.685 U1.45
  Bottom Layer w0.2: v1(13.7,25.85) 16.662,25.85 17.057,26.245 19.004,26.245 19.359,26.6 v1(20.373,26.6)
CAN_STB: IC1.8 U1.41 | length 19.9
  Top Layer w0.2: IC1.8@13.216,17.91 13.216,18.052 13.266,18.102 13.408,18.102 13.9,18.594 v1(13.9,21.8) ; v1(25,25.9) 25.038,25.938 25.038,26.299 25.425,26.685 U1.41
  Bottom Layer w0.2: v1(13.9,21.8) 15.785,23.685 23.885,23.685 25,24.8 v1(25,25.9)
CAN_TX: IC1.1 U1.46 | length 19.4
  Top Layer w0.2: IC1.1 13.216,23.689 15.545,26.018 16.227,26.7 v1(16.3,26.7) ; v1(19.642,28.642) 20.185,29.185 U1.46
  Bottom Layer w0.2: v1(16.3,26.7) 18.9,26.7 19.642,27.442 v1(19.642,28.642)
DIAG: U1.27 U3.11 | length 16.5
  Top Layer w0.2: U3.11 20.766,9.6 23.2,12.034 23.2,19.37 20.775,21.795 U1.27
DIR: U1.22 U3.19 | length 17.2
  Top Layer w0.2: v1(14.6,18.8) 17.1,16.3 U3.19 ; v1(15.195,21) 15.195,23.995 16.885,25.685 U1.22
  Bottom Layer w0.2: v1(14.6,18.8) 14.6,20.5 15.1,21 v1(15.195,21)
GND: BL1.Hole BR1.Hole C1.2 C2.1 C3.1 C4.1 C5.2 C7.1 C8.2 C9.2 C10.2 C11.2 C13.2 C14.2 C15.2 C16.2 C17.2 C18.1 C19.1 C21.2 C22.2 C23.2 D3.A IC1.2 IC1.5 IC2.4 J1.2 J2.2 J3.1 J3.SHIELD J4.1 J4.SHIELD J6.A1_B12 J6.B1_A12 J6.S1 J6.S2 J6.S3 J6.S4 J7.2 J7.4 LED1.C LED2.C LED3.C P1.3 pad.2 R1.1 R6.1 R7.2 R13.1 R21.1 R22.1 R23.1 R24.1 RST.B Sw.B TL1.Hole TR1.Hole TVS1.A TVS2.A TVS3.Common TVS4.Common U1.8 U1.23 U1.35 U1.47 U2.2 U3.3 U3.7 U3.13 U3.18 U3.29 | length 13.2
  Top Layer w0.2: C9.2 17.268,31.35 C9.2@17.518,31.1 ; v1(18.15,22.755) 18.15,21.76 C2.1 ; U1.23 18.427,25.187 19.521,25.187 v1(19.524,25.19) ; C8.2 19,31.35 C8.2@19.25,31.1 ; v2@21.773,30.365 v2(21.773,30.445) 21.774,30.446 U1.8 U1.8 ; U1.35 24.825,23.285 24.825,22.618 25.185,22.257 25.443,22.257 v2(25.5,22.2) ; v2(25.615,29.731) 25.639,29.708 26.602,29.708 U1.47 ; Sw.B@30.425,24.775 Sw.B@30.446,24.796 ; R1.1 v1(30.5,29.4)
  Bottom Layer w0.2: v1(18.15,22.755) IC2.4 ; R7.2 R7.2@22.6,27.75 ; R7.2@22.3,27.95 22.4,27.95 R7.2@22.6,27.75 ; v2(25.615,29.731) 25.615,29.635 C7.1 25.65,29.3 25.4,29.05 24.85,29.05 23.55,27.75 v1(22.95,27.75) R7.2@22.6,27.75 ; v1@30.5,29.3 v1(30.5,29.4)
  other v1: 6.4,1.1 8,1.1 9.7,1.1 11.3,1.1 12.9,1.1 14.5,1.1 16.1,1.1 17.7,1.1 19.3,1.1 20.9,1.1 35.2,1.1 36.7,1.5 5.1,2 37.9,2.6 39.5,4 1.9,5.2 40.6,5.4 1.2,6.7 41.2,7 1.1,8.2 17.192,8.382 18.092,8.382 18.892,8.382 16.3,8.4 41.2,8.6 17.192,9.182 18.092,9.182 18.892,9.182 16.3,9.2 1.1,9.8 17.192,10.082 18.092,10.082 18.892,10.082 16.3,10.1 16.308,10.918 17.2,10.9 18.1,10.9 18.9,10.9 1.1,11.4 1.1,13 1.1,14.5 1.1,16 8,17 1.1,17.5 12.566,20.608 41.2,20.9 1.1,21.3 1.1,22.8 41.2,22.8 28.627,23.249 1.1,24.3 30.75,24.775 1.1,25.8 1.1,27.4 1,28.8 1,34.7 28.3,35.008 22.611,35.327 1.2,36.3 28.5,37.585 2.3,37.6 3.6,38.9 4.8,40.1 6.2,41.2 16.2,41.3 18.9,41.3 22.9,41.3 10.6,41.4 13.2,41.4 25.6,41.4 7.8,41.5
INDEX: U1.26 U3.12 | length 15.8
  Top Layer w0.2: U3.12 20.7,10.1 22.8,12.2 22.8,19.204 20.275,21.729 U1.26
LED1: R15.2 U1.38 | length 8.1
  Top Layer w0.2: U1.38 27.715,25.185 28.1,24.8 29.183,24.8 31.583,27.2 33.45,27.2 R15.2
LED2: R16.2 U1.13 | length 5
  Top Layer w0.2: v1(15.7,30.3) 15.765,30.235 18.375,30.235 U1.13
  Bottom Layer w0.2: R16.2 15,28.85 15,29.8 15.423,30.223 15.623,30.223 v1(15.7,30.3)
MS1: U1.29 U3.9 | length 17.8
  Top Layer w0.2: U3.9 20.897,8.6 24,11.703 24,19.701 21.775,21.926 U1.29
MS2: U1.28 U3.10 | length 17.1
  Top Layer w0.2: U3.10 20.831,9.1 23.6,11.869 23.6,19.535 21.275,21.86 U1.28
NetBOOT_B: BOOT.B R1.2 U1.44 | length 21.5
  Top Layer w0.2: v1(23.975,40.75) BOOT.B@23.975,41.075 ; BOOT.B@23.975,41.275 BOOT.B@23.975,41.075 ; U1.44 28.35,28.185 28.6,28.435 R1.2 28.6,28.8 29.5,29.7 29.5,35.75 28.882,36.368 27.975,36.368 24.2,40.143 24.2,40.85 BOOT.B@23.975,41.075
  Bottom Layer w0.2: v1(23.975,40.75) 23.99,40.735 23.99,37.665 v1(24.004,37.65)
NetC8_1: C8.1 C9.1 R5.2 U1.9 | length 7.1
  Top Layer w0.2: R5.2@15.4,33.15 16.75,33.15 C9.1@16.8,33.2 ; C9.1@16.8,33.3 16.8,33.35 C9.1@17.1,33.35 ; C9.1 C8.1 ; C8.1@18.7,33.15 18.85,33 20.7,33 21.275,32.425 U1.9
NetC10_1: C10.1 U1.1 | length 2.7
  Top Layer w0.254: U1.1 25.275,31.985 25.298,32.008 25.508,32.008 26.327,32.827 26.327,33.377 C10.1
NetC12_1: C12.1 U2.1 | length 2.2
  Top Layer w0.2: C12.1@6.75,29.7 6.863,29.587 6.863,28.309 7.043,28.129 U2.1
NetC12_2: C12.2 D3.C L1.1 U2.6 | length 2.8
  Top Layer w0.2: C12.2@8.55,29.679 D3.C 9.887,29.486 U2.6 ; C12.2 8.55,29.744 v1(8.555,29.744)
NetC13_1: C13.1 J7.1 U1.5 | length 7.7
  Top Layer w0.2: U1.5 23.292,31.552 23.292,32.292 23.592,32.593 25.267,32.593 25.579,32.904 25.579,34.633 25.696,34.75 25.8,34.75 25.834,34.784 C13.1@25.834,35.005 ; J7.1 24.45,35.3 C13.1 ; J7.1@25,34.85 J7.1@25,35.35
NetC15_1: C15.1 J7.3 U1.6 | length 4.6
  Top Layer w0.2: C15.1@20.191,34.101 21.749,34.101 J7.3 22.275,33.65 22.775,33.15 U1.6
NetC20_2: C20.2 U3.6 | length 1.8
  Top Layer w0.2: U3.6 18.6,6.25 19,5.85 C20.2
NetC24_1: C24.1 U3.5 | length 5.1
  Top Layer w0.2: C24.1@17.6,3.55 17.85,3.3 C24.1 ; C24.1@17.609,2.897 17.609,4.809 18.1,5.3 U3.5
NetC24_2: C24.2 U3.4 | length 4.3
  Top Layer w0.2: C24.2@16.067,3.484 16.133,3.55 16.133,4.333 17.6,5.8 U3.4
"NetCAN TERM1_A": "CAN TERM1.A" R17.1 | length 2.3
  Top Layer w0.3: 28.357,17.9 28.807,18.35 R17.1
NetJ6_A5: J6.A5 R21.2 | length 2.5
  Top Layer w0.254: J6.A5 34.75,12.18 36.18,12.18 v1(36.2,12.2)
  Bottom Layer w0.254: v1(36.2,12.2) R21.2
NetJ6_B5: J6.B5 R24.2 | length 2.6
  Top Layer w0.254: J6.B5 34.75,15.18 36.28,15.18 v1(36.3,15.2)
  Bottom Layer w0.254: v1(36.3,15.2) R24.2
NetLED1_A: LED1.A R15.1 | length 1.6
  Top Layer w0.254: LED1.A 35.4,25.75 35.4,27.25 R15.1
NetLED2_A: LED2.A R16.1
  other v1: 16.354,28.446
NetLED3_A: LED3.A R14.1 | length 1.5
  Top Layer w0.2: R14.1 30.55,6.25 LED3.A
NetR10_1: R10.1 U2.4 | length 1.7
  Top Layer w0.2: R10.1 9.65,26.05 9.829,26.229 U2.4
NetR12_1: R12.1 R13.2 U2.3 | length 8
  Top Layer w0.2: U2.3 7.449,26.128 7.449,25.3 7.749,25 v1(7.8,25)
  Bottom Layer w0.2: v1(7.8,25) 12.75,25 12.8,25.05 14.15,25.05 R12.1
NetR22_2: R22.2 U3.23 | length 3.9
  Top Layer w0.3: R22.2 12.15,9.45 13.346,10.646 13.924,10.646 13.97,10.6 U3.23
NetR23_2: R23.2 U3.27 | length 3.7
  Top Layer w0.3: R23.2 12.324,7.174 12.874,7.174 14.3,8.6 U3.27
NRST: C7.2 R4.2 RST.A U1.7 | length 25.4
  Top Layer w0.2: RST.A@19.975,37.125 19.975,38.7 ; RST.A@19.975,41.275 19.975,38.7 ; U1.7 22.275,30.713 22.988,30 25.106,30 26.206,31.1 26.8,31.1 27.3,31.6 27.3,36 24.6,38.7 19.975,38.7
  Bottom Layer w0.2: R4.2 20.284,35.934 v1(20.284,37.154) ; C7.2 23.75,29.45 C7.2@23.9,29.3
  other v1: 23.7,30
NTC: C6.2 R3.2 R7.1 U1.10 | length 5.3
  Top Layer w0.2: U1.10 20.779,31.531 20.779,30.219 v1(20.782,30.215)
  Bottom Layer w0.2: C6.2@20.45,28 20.4,28.05 20.4,29.7 R3.2@20.499,29.799 ; R3.2 20.55,29.747 22.203,29.747 R7.1 ; R3.2@20.6,30.033 v1(20.782,30.215)
PDN_UART: R8.1 R9.1 U1.31 U3.14 | length 20.3
  Top Layer w0.2: U3.14 20.085,11.135 21.035,11.135 22.35,12.45 22.35,18.75 21.524,19.576 21.124,19.576 v1(21.1,19.6) ; v1(22.685,22.1) 22.73,22.145 22.73,23.29 U1.31 22.775,24.202 22.95,24.377 v1(22.95,24.428)
  Bottom Layer w0.2: v1(21.1,19.6) 21.1,20.1 22.608,21.608 22.608,22.023 v1(22.685,22.1) ; R8.1@21.9,26.65 22.05,26.65 22.3,26.4 22.3,25.9 22.472,25.728 23.411,25.728 23.528,25.611 R9.1 23.3,24.778 v1(22.95,24.428)
SCL: IC2.7 J3.4 R18.2 U1.42 | length 26.9
  Top Layer w0.2: U1.42 26.675,27.135 27.565,27.135 28,26.7 v1(28,26.2) ; v1(29.398,26.002) 29.475,26.078 29.75,26.078 31.8,28.128 J3.4
  Bottom Layer w0.2: IC2.7 24.35,20.315 26.635,20.315 26.65,20.3 26.7,20.35 26.9,20.35 27.35,20.8 29,20.8 29.5,21.3 29.5,25.402 29.398,25.504 29.398,25.951 v1@29.373,25.977 ; v1(28,26.2) 29.146,26.2 29.344,26.002 v1(29.398,26.002)
SDA: IC2.6 J3.3 R19.2 U1.43 | length 22.6
  Top Layer w0.2: U1.43 27.615,27.685 28.7,26.6 ; v1(28.7,25.6) 28.7,26.6 ; J3.3 30.8,36.2 29.9,35.3 29.9,29.45 29.55,29.1 29.55,27.45 28.7,26.6
  Bottom Layer w0.2: IC2.6 24.335,21.6 26.4,21.6 26.65,21.85 26.65,22.2 28.7,24.25 v1(28.7,25.6)
STEP: U1.21 U3.16 | length 18.4
  Top Layer w0.2: U1.21 16.685,26.185 14.6,24.1 14.6,19.7 18.6,15.7 U3.16
SWCLK: P1.2 U1.37 | length 28.9
  Top Layer w0.2: U1.37 26.66,24.65 27.45,24.65 27.9,24.2 29.2,24.2 31.5,21.9 v1(31.5,20.4) ; v1(27.965,11.806) 29.48,10.292 P1.2@29.48,1.6 ; v1(31.8,18.7) 31.78,18.68 31.78,16.717 32,16.497 v1(32,16.4)
  Bottom Layer w0.2: v1(27.965,11.806) 27.965,12.365 v1(32,16.4) ; v1(31.5,20.4) 31.5,20.292 31.8,19.992 v1(31.8,18.7)
SWDIO: P1.4 U1.34 | length 29.9
  Top Layer w0.2: U1.34 24.275,21.861 26.462,19.674 26.462,17.546 27.158,16.85 28.208,15.8 31.4,15.8 v1(31.9,15.3)
  Bottom Layer w0.2: P1.4@24.4,1.6 24.4,6.3 31.9,13.8 v1(31.9,15.3)
TMC_E\N\: R20.1 U1.25 U3.2 | length 27.9
  Top Layer w0.2: R20.1@14.3,4.95 15.7,4.95 16.6,5.85 v1(16.6,5.9) U3.2 ; v1(18.324,16.824) 18.3,16.849 18.3,19.057 19.775,20.532 U1.25
  Bottom Layer w0.2: v1(16.6,5.9) 16.975,6.275 16.975,6.93 17.195,7.15 19.877,7.15 20.455,7.728 20.455,11.645 19.679,12.421 17.884,12.421 17.4,12.905 17.4,15.9 v1(18.324,16.824)
TP_VSYS: C11.1 D1.C D2.C R10.2 U2.5 | length 14.5
  Top Layer w0.2: U2.5 C11.1 11.519,24.731 R10.2
  Bottom Layer w0.6: v1(25.2,27.5) 25.335,27.635 D2.C@35.515,27.635
  other v4: 11.504,27.917
USART_TX: R8.2 U1.30 | length 1.2
  Top Layer w0.2: v1(22.065,24.415) 22.065,24.307 22.225,24.147 22.225,23.385 U1.30
USB-C_VBUS_5V: D2.A J6.A4_B9 J6.B4_A9 | length 15.9
  Top Layer w0.4: v1(33.4,11.3) 33.7,11 33.9,11 33.91,11.01 J6.A4_B9 ; v1(33.4,16.5) 33.428,16.472 33.428,16.093 33.711,15.81 J6.B4_A9
  Bottom Layer w0.4: v1(33.4,11.3) 33.4,17.9 36,20.5 D2.A
USB_D_N: J6.A7 J6.B7 TVS4.D2 U1.32 | length 20.5
  Top Layer w0.2: U1.32 23.285,23.325 23.285,21.074 25.527,18.832 25.527,16.473 27.78,14.22 31.714,14.22 32.902,13.032 32.902,12.855 TVS4.D2 33.307,12.66 33.865,12.66 J6.B7 ; 33.865,12.7 33.865,13.432 34.043,13.61 34.68,13.61 J6.A7
USB_D_P: J6.A6 J6.B6 R11.2 TVS4.D1 U1.33 | length 20.5
  Top Layer w0.2: U1.33 23.765,23.325 23.765,21.291 23.948,21.108 23.948,21.107 26.007,19.048 26.007,16.672 27.979,14.7 31.879,14.7 32.816,13.763 33.034,13.763 33.151,13.88 33.151,14.175 33.142,14.175 TVS4.D1@33.127,14.19 ; TVS4.D1 33.517,14.16 J6.B6 34.78,14.11 35.424,14.11 35.6,13.934 35.6,13.386 35.424,13.21 34.78,13.21 J6.A6
USER_SW: Sw.A U1.17 | length 25.5
  Top Layer w0.254: U1.17 18.448,28.162 19.238,28.162 19.746,27.654 19.746,26.304 20.706,25.344 24.656,25.344 25.915,24.085 27.115,24.085 27.6,23.6 27.6,20.3 28.3,19.6 32.1,19.6 32.575,20.075 32.575,20.825 Sw.A@32.575,24.975
VIN_SENSE: R2.1 R6.2 U1.11 | length 13
  Top Layer w0.254: v1(15.5,38.1) 15.5,38.06 15.15,37.71 R2.1 14.7,35.5 14.3,35.1 14.3,32.8 14.6,32.5 20.1,32.5 20.275,32.325 U1.11
XT30_IN: F1.1 J1.1
  other v1: 5.8,31.2 7.7,31.3 12.385,31.39 9.7,31.4 5.8,32.8 7.7,32.9 9.6,32.9 12.4,33.1 12.4,34
XT30_OUT: C5.1 C20.1 C21.1 C22.1 C23.1 D1.A F1.2 J2.1 R2.2 TVS1.C U3.22 U3.28 | length 0.7
  Top Layer w0.254: R2.2 R2.2@17.055,35.495
  Top Layer w0.8: v1(19.1,3.25) C20.1@19.1,3.9
  other v1: 22.2,7.3 23,7.3 13.75,12.3 30.8,31.4 37.1,31.4 34.9,31.5 32.9,31.6 26.4,31.9 37.1,32.7 31.087,32.878 32.907,32.898 35,32.9 17.6,34.2
  other v3: 14.575,7.709
  other v6: 16.2,14.1
pads on no net: IC1.9 IC1.V IC2.3 IC2.5 J6. J6.A8 J6.B8 P2.3 P2.4 P3.3 P3.4 U1.2 U1.3 U1.4 U1.12 U1.16 U1.18 U1.19 U1.20 U1.39 U1.40 U3.20 U3.25

## Polygon pours and split planes (outlines as drawn)
GND on Bottom Layer "NONET_L-01_P-001" (solid, remove dead copper, pour order 1): 48.6,52 48.6,-2.2 -5.9,-2.2 -5.9,53.3
GND on Top Layer "NONET_L-01_P-001" (solid, remove dead copper, pour order 0): 48.5,50.5 48.5,-6.9 -5.7,-6.9 -5.7,50.3
TP_VSYS on Int2 (PWR) (split plane): 25.357,27.957 25.823,27.491 25.823,27.369 24.917,26.462 24.901,26.475 24.852,26.495 24.8,26.502 10.285,26.502 9.766,27.02 9.766,27.569 10.895,28.698 24.616,28.698
XT30_OUT on Int2 (PWR) (split plane): 28.557,34.057 28.599,34.025 28.648,34.005 28.7,33.998 41.116,33.998 41.398,33.716 41.398,30.584 40.916,30.102 32.395,30.102 32.343,30.095 32.309,30.081 32.295,30.075 32.253,30.043 23.91,21.7 23.157,20.947 23.125,20.905 23.105,20.857 23.098,20.805 23.098,17.048 20.457,14.408 20.425,14.366 20.405,14.317 20.398,14.265 20.398,12.906 20.405,12.854 20.425,12.805 20.457,12.763 23.851,9.369 23.851,6.637 20.016,2.802 14.184,2.802 11.602,5.384 11.602,11.116 19.943,19.457 19.975,19.499 19.995,19.548 20.002,19.6 20.002,20.977 26.168,27.143 26.2,27.185 26.22,27.233 26.227,27.285 26.227,27.435 26.227,27.575 26.227,30.4 26.22,30.452 26.2,30.501 26.168,30.543 26.126,30.575 26.077,30.595 26.025,30.602 16.884,30.602 16.702,30.784 16.702,34.798 27.816,34.798
XT30_IN on Int2 (PWR) (split plane): 13.198,34.516 13.198,30.964 12.116,29.881 2.204,29.881 1.702,30.384 1.702,33.316 2.684,34.298 8.5,34.298 8.552,34.305 8.601,34.325 8.643,34.357 9.384,35.098 12.616,35.098
3V3 on Int2 (PWR) (split plane): 202 vertices, not listed, extent 0.509,0.509 41.791,41.811
GND on Int1 (GND) (split plane): 35.774,41.802 35.99,41.774 36.202,41.727 36.409,41.662 36.61,41.578 36.803,41.478 36.986,41.361 37.159,41.229 37.307,41.093 37.317,41.08 41.06,37.337 41.073,37.327 41.209,37.179 41.341,37.006 41.458,36.823 41.558,36.63 41.642,36.429 41.707,36.222 41.754,36.01 41.782,35.794 41.791,35.593 41.79,35.577 41.79,6.743 41.791,6.727 41.782,6.526 41.754,6.31 41.707,6.098 41.642,5.891 41.558,5.69 41.458,5.497 41.341,5.314 41.209,5.141 41.073,4.993 41.06,4.983 37.317,1.24 37.307,1.227 37.159,1.091 36.986,0.959 36.803,0.842 36.61,0.742 36.409,0.658 36.202,0.593 35.99,0.546 35.774,0.518 35.573,0.509 35.557,0.51 6.743,0.51 6.727,0.509 6.526,0.518 6.31,0.546 6.098,0.593 5.891,0.658 5.69,0.742 5.497,0.842 5.314,0.959 5.141,1.091 4.993,1.227 4.983,1.24 1.24,4.983 1.227,4.993 1.091,5.141 0.959,5.314 0.842,5.497 0.742,5.69 0.658,5.891 0.593,6.098 0.546,6.31 0.518,6.526 0.509,6.727 0.51,6.743 0.51,35.577 0.509,35.593 0.518,35.794 0.546,36.01 0.593,36.222 0.658,36.429 0.742,36.63 0.842,36.823 0.959,37.006 1.091,37.179 1.227,37.327 1.24,37.337 4.983,41.08 4.993,41.093 5.141,41.229 5.314,41.361 5.497,41.478 5.69,41.578 5.891,41.662 6.098,41.727 6.31,41.774 6.526,41.802 6.727,41.811 6.743,41.81 35.557,41.81 35.573,41.811

## Other copper
Top Layer:
  region net 3V3: 21.56,40.124 21.74,39.944 22.03,40.003 22.15,40.237 22.15,41.275 21.5,41.275
  region net XT30_OUT: 17.4,35.5 17.408,34.659 17.783,34.413 17.805,34.261 17.581,33.908 16.9,34.261 16.7,34.461 16.7,35.317 16.883,35.5
  region net B2: 16.201,7.521 15.984,7.488 14.884,6.567 14.849,6.483 15.213,6.141 15.849,6.567 16.201,6.745
  region net XT30_OUT: 14.1,14 14.1,12.024 13.676,12.024 13.4,12.3 13.4,14
  region net XT30_OUT: 14.017,12.189 14.5,11.5 15.521,10.965 14.085,10.965 13.538,11.144 13.4,11.65 13.538,11.788 13.538,12.162
  region net XT30_OUT: 15.15,8.235 14.779,8.235 14.371,7.973 14.59,7.41 14.839,7.504
  region net A2: 16.1,11.744 15.069,12.556 15.362,12.973 16.1,12.421
  region net B1: 15.15,9.235 13.935,9.235 13.602,9.285 13.8,9.1 13.573,8.721 14,8.9 14.285,8.975 15.15,8.974
  region net A1: 15.15,10.235 14.779,10.235 13.911,10.235 13.587,10.198 13.552,9.852 13.622,9.654 13.683,9.613 14.711,9.965 15.15,9.965
Bottom Layer:
  region net 3V3: 14.3,27.15 12.698,27.15 12.669,27.179 12.4,26.91 12.4,26.45 13.65,26.45 14.3,26.45
  region net XT30_IN: 1.7,33.04 2.2,33.6 9.3,33.7 11.44,34.723 13,34.723 13,31.05 12.613,30.9 4.5,30.24 2.8,30.9 2.2,31.5
  region net XT30_OUT: 28.251,31.08 41.2,30.1 41.2,33.3 18.44,34.723 17.273,34.723 16.842,31.239
Int2 (PWR) (plane layer: these items are gaps in the copper):
  lines w0.4: 24.8,26.3 10.201,26.3 9.565,26.936 9.565,27.653 10.812,28.9 24.7,28.9 25.5,28.1 26.025,27.575 26.025,27.435 ; 1.5,30.3 1.5,33.4 2.6,34.5 8.5,34.5 9.3,35.3 12.7,35.3 13.4,34.6 13.4,30.88 12.199,29.679 2.121,29.679 1.5,30.3 ; 11.4,5.3 11.4,11.2 19.8,19.6 19.8,21.06 26.025,27.285 26.025,30.4 16.8,30.4 16.5,30.7 16.5,35 27.9,35 28.7,34.2 41.2,34.2 41.6,33.8 41.6,30.5 41,29.9 32.395,29.9 24.053,21.558 23.3,20.805 23.3,16.965 20.6,14.265 20.6,12.906 24.053,9.453 24.053,6.553 20.1,2.6 14.1,2.6 11.4,5.3

## Silkscreen, mask and mechanical layers (free items; w line width, h text height)
Drill Drawing:
  lines w0.4: 10.8,151.2 60.207,151.2 ccw(c60.207,154.2) 62.328,152.079 66.071,155.822 ccw(c63.95,157.943) 66.95,157.943 66.95,186.777 ccw(c63.95,186.777) 66.071,188.898 62.328,192.641 ccw(c60.207,190.52) 60.207,193.52 31.393,193.52 ccw(c31.393,190.52) 29.272,192.641 25.529,188.898 ccw(c27.65,186.777) 24.65,186.777 24.65,134.2 ; 24.65,157.943 ccw(c27.65,157.943) 25.529,155.822 29.272,152.079 ccw(c31.393,154.2) 31.393,151.2

## Text inside footprints (layer, text, board x,y; h text height)
"CAN TERM1": Top Assembly "ON" at 26.579,19.126 h2 r270
P2: Top 3D Body "PCB Edge" at 42.258,21.449 h0.41 r270
P3: Top 3D Body "PCB Edge" at 0.642,21.951 h0.41 r90